# Allegro board 1010260-900-0012_PCB_Rev-a.brd
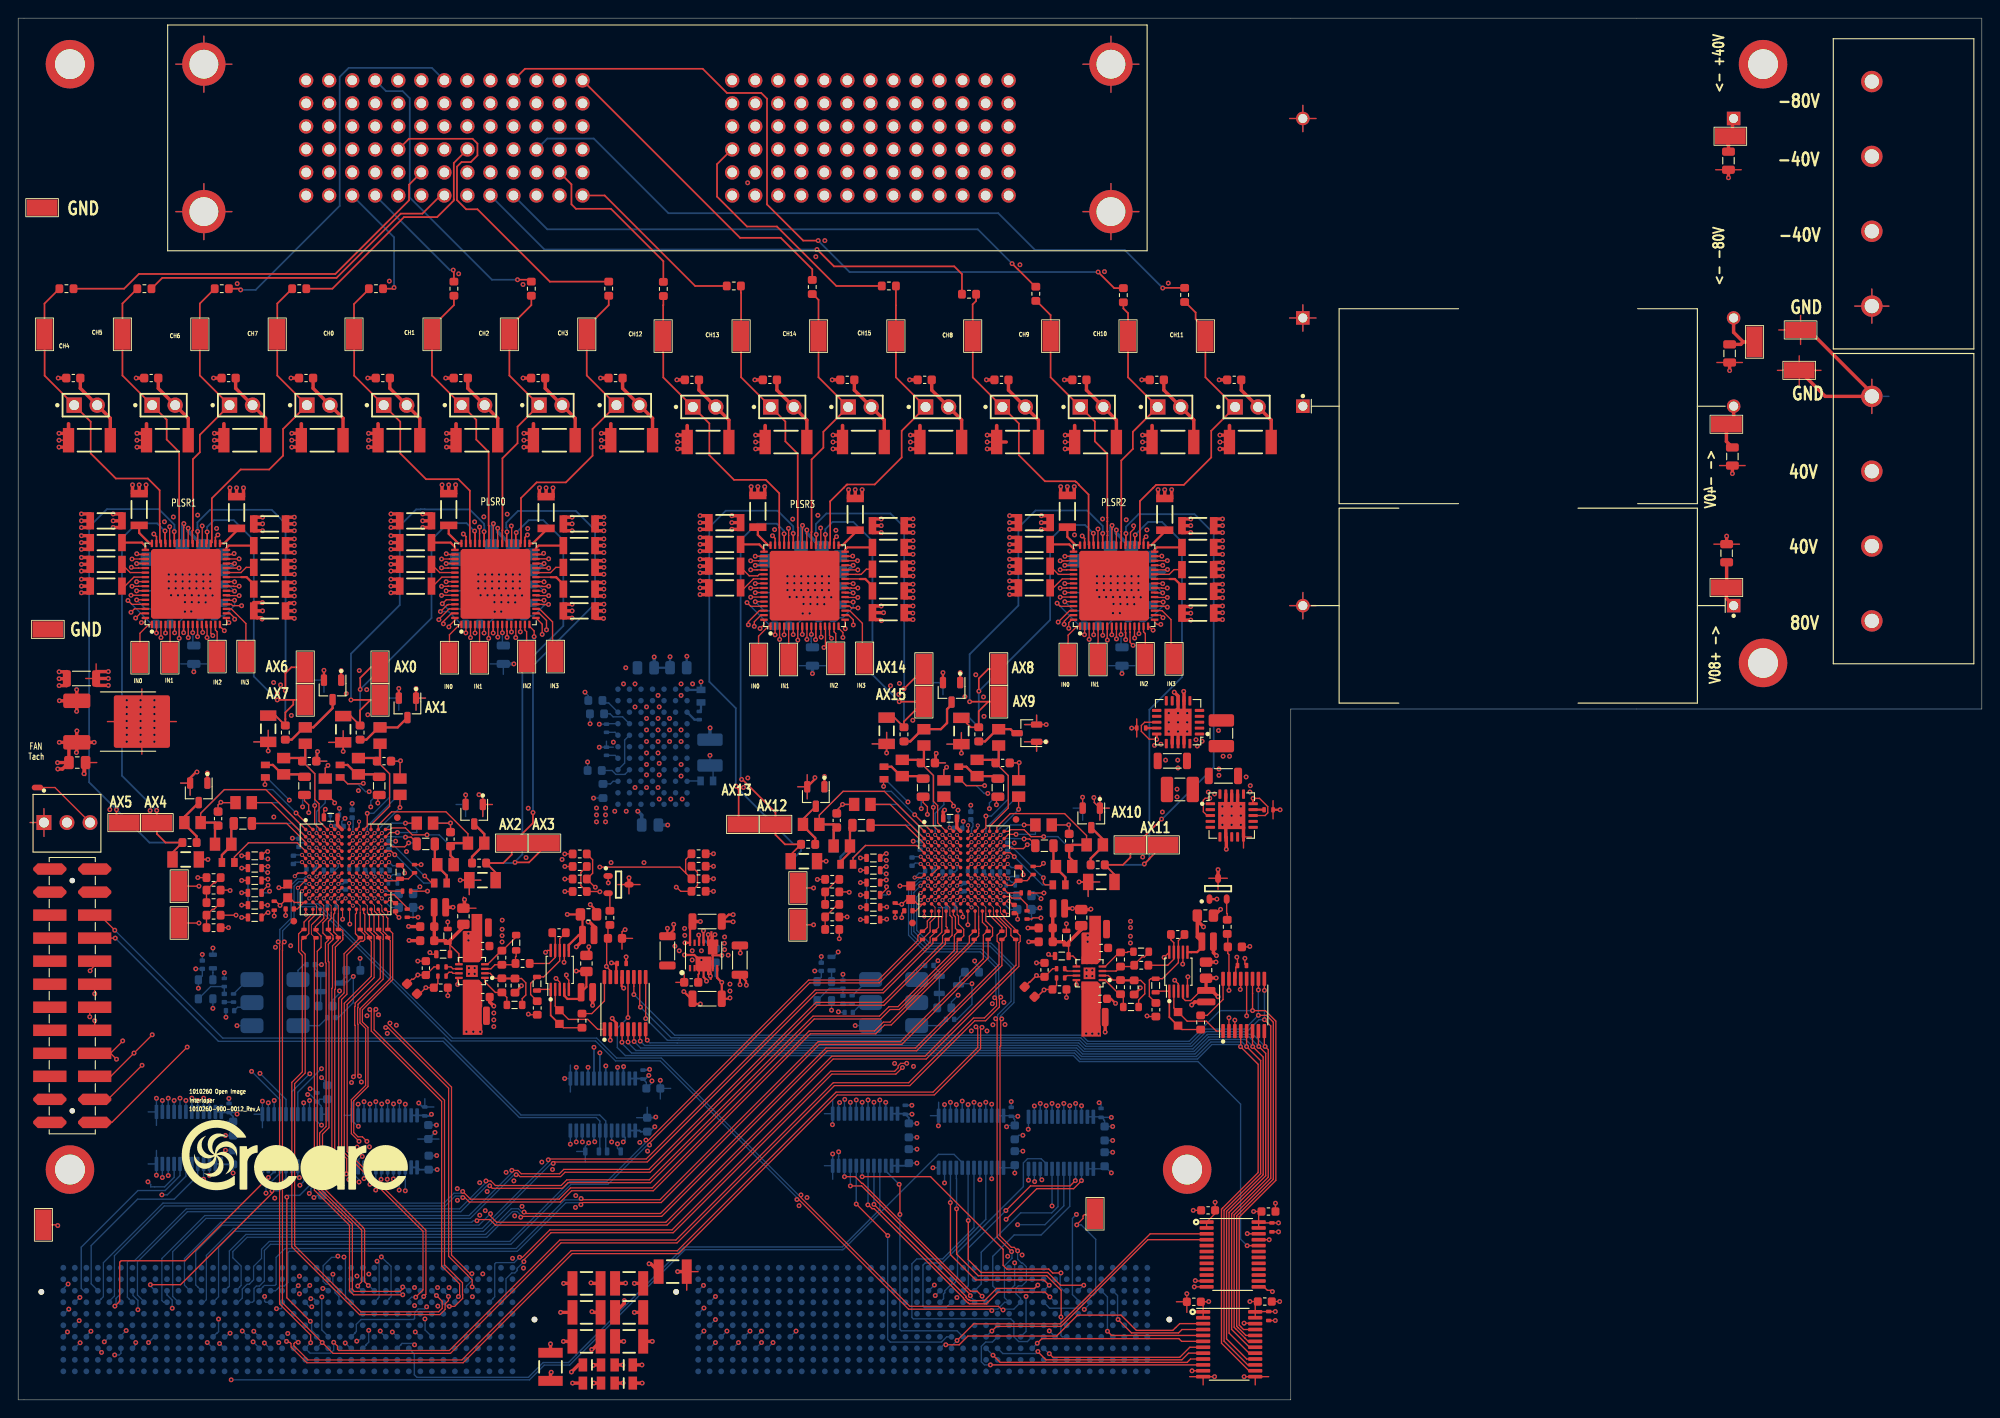
[diagram p0: board, top side]
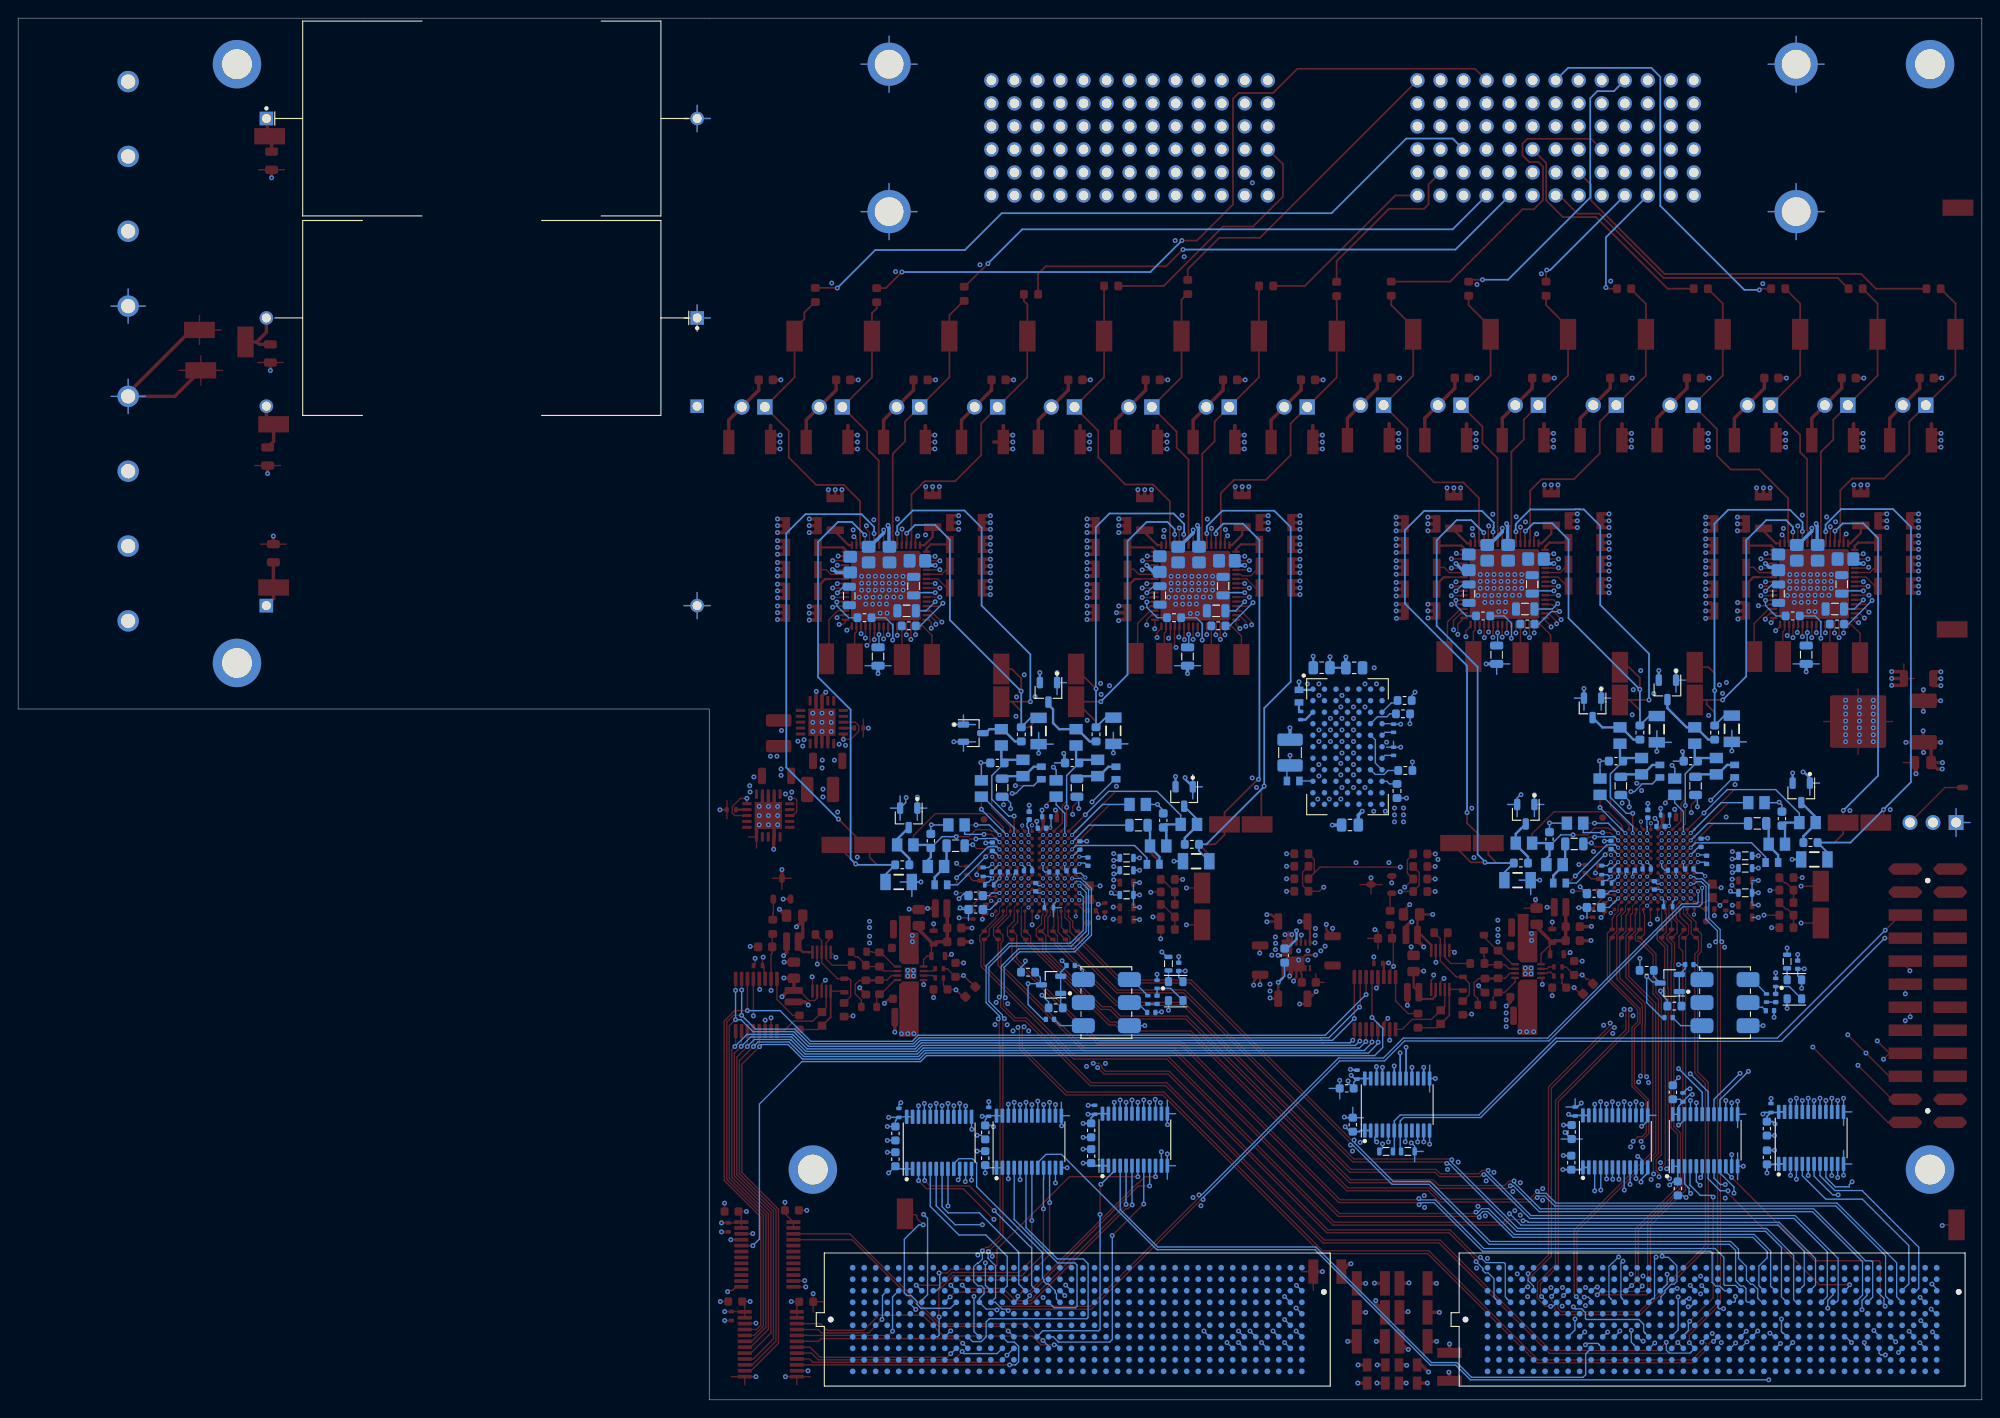
[diagram p1: board, bottom side, seen from below]

Outline 216.53 x 152.4 mm; copper layers: TOP, L2 - GND, L3 - SIG1, L4 - POWER/GND, L5 - POWER, L6 - POWER, L7 - GND, L8 - SIG4, L9 - GND, BOTTOM. Coordinates in mm from the lower left corner of the outline.
Outline path: 0,152.4 0,0 140.33,0 140.33,76.2 216.53,76.2 216.53,152.4 0,152.4

## Design rules (mm)
constraint set DEFAULT: min track width 0.152
net group AFE0_DATA0: nets AFE0_DATA0N AFE0_DATA0P
net group AFE0_DATA1: nets AFE0_DATA1N AFE0_DATA1P
net group AFE0_DATA2: nets AFE0_DATA2N AFE0_DATA2P
net group AFE0_DATA3: nets AFE0_DATA3N AFE0_DATA3P
net group AFE0_DATA4: nets AFE0_DATA4N AFE0_DATA4P
net group AFE0_DATA5: nets AFE0_DATA5N AFE0_DATA5P
net group AFE0_DATA6: nets AFE0_DATA6N AFE0_DATA6P
net group AFE0_DATA7: nets AFE0_DATA7N AFE0_DATA7P
net group AFE0_DCO: nets AFE0_DCON AFE0_DCOP
net group AFE0_FCO: nets AFE0_FCON AFE0_FCOP
net group AFE1_DATA0: nets AFE1_DATA0N AFE1_DATA0P
net group AFE1_DATA1: nets AFE1_DATA1N AFE1_DATA1P
net group AFE1_DATA2: nets AFE1_DATA2N AFE1_DATA2P
net group AFE1_DATA3: nets AFE1_DATA3N AFE1_DATA3P
net group AFE1_DATA4: nets AFE1_DATA4N AFE1_DATA4P
net group AFE1_DATA5: nets AFE1_DATA5N AFE1_DATA5P
net group AFE1_DATA6: nets AFE1_DATA6N AFE1_DATA6P
net group AFE1_DATA7: nets AFE1_DATA7N AFE1_DATA7P
net group AFE1_DCO: nets AFE1_DCON AFE1_DCOP
net group AFE1_FCO: nets AFE1_FCON AFE1_FCOP
net group AFE_CLK: nets AFE_CLKN AFE_CLKP
net group AFE_TRIG: nets AFE_TRIGN AFE_TRIGP
net group INTCAPS: nets N16174964 N16174980 N16175044 N16175092 N16187781 N16187837 N16198090 N16198108 N16201458 N16201474 N16201598 N16201646 N16201868 N16201872 N16201892 N16201896 N16209414 N16209430 N16209554 N16209602 N16209824 N16209828 N16209848 N16209852 N16211890 N16211906 N16212030 N16212078 N16212300 N16212304 N16212324 N16212328

## Placement (name value [footprint] x y rotation side)
C1  10uF  [CAPC2013X100N]  63.27 1.85 0 top
C2  10uF  [CAPC2013X100N]  63.27 3.85 0 top
C3  100uF  [CAPC3225X270N]  62.67 9.65 0 top
C4  100uF  [CAPC3225X270N]  62.67 6.45 0 top
C5  100uF  [CAPC3225X270N]  62.67 12.85 0 top
C6  100uF  [CAPC3225X270N]  72.17 14.15 0 top
C7  0.1uF  [CAPC160X80X90L35N]  131.22 20.9 0 top
C8  1uF  [CAPC100X50X55L15N]  138.25 19.02 270 top
C9  0.1uF  [CAPC160X80X90L35N]  129.64 10.82 0 top
C10  1uF  [CAPC100X50X55L15N]  137.9 9.25 270 top
C11  0.1uF  [CAPC160X80X90L35N]  137.87 20.78 0 top
C12  0.1uF  [CAPC160X80X90L35N]  137.46 10.85 0 top
C13  0.1uF  [CAPC160X80X90L35N]  119.8 26.54 270 bottom
C14  1uF  [CAPC100X50X55L15N]  119.41 31.65 90 bottom
C15  0.1uF  [CAPC160X80X90L35N]  98.21 26.88 270 bottom
C16  1uF  [CAPC100X50X55L15N]  97.82 31.99 90 bottom
C17  10uF  [CAPC2013X100N]  66.77 3.85 180 top
C18  10uF  [CAPC2013X100N]  66.77 1.85 180 top
C19  100uF  [CAPC3225X270N]  67.37 6.45 180 top
C20  100uF  [CAPC3225X270N]  67.37 9.65 180 top
C21  100uF  [CAPC3225X270N]  58.7 3.65 270 top
C22  100uF  [CAPC3225X270N]  67.37 12.85 180 top
C23  0.1uF  [CAPC160X80X90L35N]  23.7 26.75 270 bottom
C24  1uF  [CAPC100X50X55L15N]  23.26 32.19 90 bottom
C25  0.1uF  [CAPC160X80X90L35N]  33.53 23.32 90 bottom
C26  1uF  [CAPC100X50X55L15N]  32.96 33.36 90 bottom
C27  0.1uF  [CAPC160X80X90L35N]  23.71 29.92 270 bottom
C28  0.1uF  [CAPC160X80X90L35N]  34.08 33.93 90 bottom
C29  0.1uF  [CAPC160X80X90L35N]  45.28 26.16 270 bottom
C30  1uF  [CAPC100X50X55L15N]  44.85 31.81 90 bottom
C31  10nF  [CAPC2013X94N]  39.9 73.27 270 bottom
C32  10nF  [CAPC2013X94N]  19.23 63.67 0 top
C33  10nF  [CAPC2013X94N]  42.11 67.63 270 bottom
C34  47pF  [CAPC160X80X87L35N]  40.34 70.45 180 bottom
C35  10nF  [CAPC2013X94N]  37.52 69.89 270 bottom
C36  47pF  [CAPC160X80X87L35N]  22.05 64.11 270 top
C37  10nF  [CAPC2013X94N]  22.61 61.29 0 top
C38  10nF  [CAPC2013X94N]  42.11 67.63 270 top
C39  10nF  [CAPC2013X94N]  39.9 73.27 270 top
C40  10nF  [CAPC2013X94N]  19.23 63.67 0 bottom
C41  10nF  [CAPC2013X94N]  44.86 63.61 180 top
C42  47pF  [CAPC160X80X87L35N]  40.34 70.45 180 top
C43  10nF  [CAPC2013X94N]  37.52 69.89 270 top
C44  47pF  [CAPC160X80X87L35N]  22.05 64.11 270 bottom
C45  10nF  [CAPC2013X94N]  22.61 61.29 0 bottom
C46  10nF  [CAPC2013X94N]  44.86 63.61 180 bottom
C47  10nF  [CAPC2013X94N]  50.5 61.41 180 top
C48  10nF  [CAPC2013X94N]  31.66 73.27 270 bottom
C49  10nF  [CAPC2013X94N]  29.28 69.89 270 bottom
C50  10nF  [CAPC2013X94N]  24.87 65.87 0 top
C51  47pF  [CAPC160X80X87L35N]  47.68 61.85 270 top
C52  10nF  [CAPC2013X94N]  47.12 59.03 180 top
C53  47pF  [CAPC160X80X87L35N]  32.1 70.45 180 bottom
C54  10nF  [CAPC2013X94N]  24.87 65.87 0 bottom
C55  10nF  [CAPC2013X94N]  50.5 61.41 180 bottom
C56  10nF  [CAPC2013X94N]  31.66 73.27 270 top
C57  47pF  [CAPC160X80X87L35N]  47.68 61.85 270 bottom
C58  10nF  [CAPC2013X94N]  47.12 59.03 180 bottom
C59  47pF  [CAPC160X80X87L35N]  32.1 70.45 180 top
C60  10nF  [CAPC2013X94N]  29.28 69.89 270 top
C61  10nF  [CAPC2013X94N]  33.86 67.63 270 bottom
C62  10nF  [CAPC2013X94N]  33.86 67.63 270 top
C63  1nF  [CAPC100X50X55L25N]  36.83 64.64 90 bottom
C64  10nF  [CAPC160X80X90L35N]  44.96 47.62 270 top
C65  1uF  [CAPC100X50X55L15N]  28.23 54.51 90 top
C66  0.1uF  [CAPC100X50X55L20N]  29.95 54.14 180 top
C67  1uF  [CAPC100X50X55L15N]  41.33 57 0 bottom
C68  0.1uF  [CAPC100X50X55L20N]  40.51 58.42 180 bottom
C69  0.1uF  [CAPC100X50X55L20N]  34.16 58.42 180 bottom
C70  10nF  [CAPC160X80X90L35N]  46.61 45.47 180 top
C71  0.1uF  [CAPC100X50X55L20N]  41.62 54.33 270 top
C72  1pF  [CAPC1608X73N]  59.68 42.22 90 top
C73  1uF  [CAPC100X50X55L15N]  41.91 58.42 270 bottom
C74  0.1uF  [CAPC100X50X55L20N]  38.73 58.42 180 bottom
C75  0.1uF  [CAPC100X50X55L20N]  36.96 58.55 0 bottom
C76  0.1uF  [CAPC100X50X55L20N]  32.26 58.55 0 bottom
C77  0.1uF  [CAPC100X50X55L20N]  30.35 59.56 270 bottom
C78  1uF  [CAPC100X50X55L15N]  34.59 54.41 180 bottom
C79  0.1uF  [CAPC100X50X55L20N]  36.11 56.75 270 bottom
C80  0.1uF  [CAPC100X50X55L20N]  30.96 61.44 270 bottom
C81  0.1uF  [CAPC100X50X55L20N]  40.89 61.21 270 bottom
C82  0.1uF  [CAPC100X50X55L20N]  22.73 44.32 270 bottom
C83  0.1uF  [CAPC100X50X55L20N]  20.31 47.99 270 bottom
C84  0.1uF  [CAPC100X50X55L20N]  34.54 42.16 0 bottom
C85  0.1uF  [CAPC100X50X55L20N]  23.37 42.93 180 bottom
C86  0.1uF  [CAPC100X50X55L20N]  32.26 48.01 0 bottom
C87  1uF  [CAPC100X50X55L15N]  34.92 64.52 0 bottom
C88  0.1uF  [CAPC100X50X55L20N]  35.43 63.25 180 bottom
C89  10nF  [CAPC2013X94N]  108.12 73.07 270 bottom
C90  10nF  [CAPC2013X94N]  87.44 63.47 0 top
C91  10nF  [CAPC2013X94N]  110.32 67.43 270 bottom
C92  47pF  [CAPC160X80X87L35N]  108.56 70.25 180 bottom
C93  10nF  [CAPC2013X94N]  105.74 69.69 270 bottom
C94  47pF  [CAPC160X80X87L35N]  90.26 63.91 270 top
C95  10nF  [CAPC2013X94N]  90.82 61.09 0 top
C96  10nF  [CAPC2013X94N]  110.32 67.43 270 top
C97  10nF  [CAPC2013X94N]  108.12 73.07 270 top
C98  10nF  [CAPC2013X94N]  87.44 63.47 0 bottom
C99  10nF  [CAPC2013X94N]  113.07 63.41 180 top
C100  47pF  [CAPC160X80X87L35N]  108.56 70.25 180 top
C101  10nF  [CAPC2013X94N]  105.74 69.69 270 top
C102  47pF  [CAPC160X80X87L35N]  90.26 63.91 270 bottom
C103  10nF  [CAPC2013X94N]  90.82 61.09 0 bottom
C104  10nF  [CAPC2013X94N]  113.07 63.41 180 bottom
C105  10nF  [CAPC2013X94N]  118.71 61.21 180 top
C106  10nF  [CAPC2013X94N]  99.88 73.07 270 bottom
C107  10nF  [CAPC2013X94N]  97.5 69.69 270 bottom
C108  10nF  [CAPC2013X94N]  93.09 65.67 0 top
C109  47pF  [CAPC160X80X87L35N]  115.89 61.65 270 top
C110  10nF  [CAPC2013X94N]  115.33 58.83 180 top
C111  47pF  [CAPC160X80X87L35N]  100.32 70.25 180 bottom
C112  10nF  [CAPC2013X94N]  93.09 65.67 0 bottom
C113  10nF  [CAPC2013X94N]  118.71 61.21 180 bottom
C114  10nF  [CAPC2013X94N]  99.88 73.07 270 top
C115  47pF  [CAPC160X80X87L35N]  115.89 61.65 270 bottom
C116  10nF  [CAPC2013X94N]  115.33 58.83 180 bottom
C117  47pF  [CAPC160X80X87L35N]  100.32 70.25 180 top
C118  10nF  [CAPC2013X94N]  97.5 69.69 270 top
C119  10nF  [CAPC2013X94N]  102.08 67.43 270 bottom
C120  10nF  [CAPC2013X94N]  102.08 67.43 270 top
C121  1nF  [CAPC100X50X55L25N]  105.05 64.45 90 bottom
C122  1uF  [CAPC100X50X55L15N]  96.71 54.31 90 top
C123  0.1uF  [CAPC100X50X55L20N]  109.83 54.14 270 top
C124  1uF  [CAPC100X50X55L15N]  109.45 56.79 0 bottom
C125  0.1uF  [CAPC100X50X55L20N]  102.38 58.22 180 bottom
C126  0.1uF  [CAPC100X50X55L20N]  108.73 58.22 180 bottom
C127  0.1uF  [CAPC100X50X55L20N]  98.17 53.95 180 top
C128  1pF  [CAPC1608X73N]  127.9 42.02 90 top
C129  10nF  [CAPC160X80X90L35N]  114.83 45.27 180 top
C130  10nF  [CAPC160X80X90L35N]  113.17 47.43 270 top
C131  1uF  [CAPC100X50X55L15N]  110.13 58.22 270 bottom
C132  0.1uF  [CAPC100X50X55L20N]  98.57 59.37 270 bottom
C133  0.1uF  [CAPC100X50X55L20N]  105.17 58.35 0 bottom
C134  0.1uF  [CAPC100X50X55L20N]  100.47 58.35 0 bottom
C135  0.1uF  [CAPC100X50X55L20N]  106.95 58.22 180 bottom
C136  10uF  [CAPC200X125X135L45N]  62.89 53.54 0 top
C137  0.1uF  [CAPC127X200X102L25]  119.38 51.92 0 top
C138  1uF  [CAPC100X50X55L15N]  102.88 54.29 180 bottom
C139  0.1uF  [CAPC100X50X55L20N]  99.46 61.14 270 bottom
C140  0.1uF  [CAPC100X50X55L20N]  109.11 61.02 270 bottom
C141  0.1uF  [CAPC100X50X55L20N]  104.33 56.55 270 bottom
C142  0.1uF  [CAPC100X50X55L20N]  88.56 47.76 270 bottom
C143  0.1uF  [CAPC100X50X55L20N]  90.95 44.13 270 bottom
C144  0.1uF  [CAPC100X50X55L20N]  102.76 41.97 0 bottom
C145  0.1uF  [CAPC100X50X55L20N]  91.58 42.73 180 bottom
C146  0.1uF  [CAPC100X50X55L20N]  100.47 47.91 0 bottom
C147  2.2uF  [CAPC200X125X145L30N]  16.22 87.23 180 bottom
C148  2.2uF  [CAPC3317X190N]  27.74 87.02 180 top
C149  2.2uF  [CAPC3317X190N]  9.7 96.95 0 top
C150  2.2uF  [CAPC200X125X145L30N]  53.5 82.19 90 bottom
C151  2.2uF  [CAPC200X125X145L30N]  50.35 87.23 180 bottom
C152  2.2uF  [CAPC200X125X145L30N]  56.55 88.92 90 bottom
C153  2.2uF  [CAPC3317X190N]  61.87 87.02 180 top
C154  2.2uF  [CAPC3317X190N]  43.83 96.95 0 top
C155  2.2uF  [CAPC3317X190N]  61.87 89.42 0 top
C156  2.2uF  [CAPC3317X190N]  58.22 97.87 90 top
C157  2.2uF  [CAPC3317X190N]  43.83 89.75 180 top
C158  2.2uF  [CAPC3317X190N]  47.48 98.2 90 top
C159  1uF  [CAPC200X125X150L55N]  52.24 93.43 90 bottom
C160  2.2uF  [CAPC200X125X145L30N]  49.58 89.95 270 bottom
C161  1uF  [CAPC200X125X150L55N]  54.54 93.43 90 bottom
C162  2.2uF  [CAPC3317X190N]  27.74 89.42 0 top
C163  1uF  [CAPC200X125X150L55N]  56.57 92.38 270 bottom
C164  2.2uF  [CAPC3317X190N]  24.09 97.87 90 top
C165  2.2uF  [CAPC3317X190N]  43.83 92.15 180 top
C166  2.2uF  [CAPC3317X190N]  61.87 91.82 0 top
C167  1uF  [CAPC200X125X150L55N]  49.16 92.74 180 bottom
C168  2.2uF  [CAPC3317X190N]  61.87 94.22 0 top
C169  2.2uF  [CAPC3317X190N]  43.83 94.55 180 top
C170  2.2uF  [CAPC3317X190N]  61.87 96.62 0 top
C171  2.2uF  [CAPC200X125X145L30N]  22.42 88.92 90 bottom
C172  2.2uF  [CAPC200X125X145L30N]  19.37 82.19 90 bottom
C173  2.2uF  [CAPC3317X190N]  9.7 89.75 180 top
C174  2.2uF  [CAPC3317X190N]  13.35 98.2 90 top
C175  1uF  [CAPC200X125X150L55N]  18.11 93.43 90 bottom
C176  1uF  [CAPC200X125X150L55N]  20.41 93.43 90 bottom
C177  2.2uF  [CAPC3317X190N]  9.7 92.15 180 top
C178  2.2uF  [CAPC3317X190N]  27.74 94.22 0 top
C179  2.2uF  [CAPC200X125X145L30N]  15.45 89.95 270 bottom
C180  1uF  [CAPC200X125X150L55N]  15.03 92.74 180 bottom
C181  2.2uF  [CAPC3317X190N]  27.74 91.82 0 top
C182  2.2uF  [CAPC3317X190N]  9.7 94.55 180 top
C183  1uF  [CAPC200X125X150L55N]  22.44 92.38 270 bottom
C184  2.2uF  [CAPC3317X190N]  27.74 96.62 0 top
C185  2.2uF  [CAPC200X125X145L30N]  84.44 87.03 180 bottom
C186  2.2uF  [CAPC3317X190N]  95.95 86.82 180 top
C187  2.2uF  [CAPC3317X190N]  77.91 96.76 0 top
C188  2.2uF  [CAPC3317X190N]  130.08 89.17 0 top
C189  2.2uF  [CAPC3317X190N]  126.43 97.67 90 top
C190  2.2uF  [CAPC200X125X145L30N]  90.64 88.72 90 bottom
C191  2.2uF  [CAPC200X125X145L30N]  87.59 81.99 90 bottom
C192  2.2uF  [CAPC3317X190N]  112.04 89.56 180 top
C193  2.2uF  [CAPC3317X190N]  115.69 98.01 90 top
C194  1uF  [CAPC200X125X150L55N]  120.45 93.23 90 bottom
C195  1uF  [CAPC200X125X150L55N]  122.76 93.23 90 bottom
C196  2.2uF  [CAPC3317X190N]  112.04 91.96 180 top
C197  2.2uF  [CAPC3317X190N]  130.08 94.02 0 top
C198  2.2uF  [CAPC200X125X145L30N]  83.67 89.75 270 bottom
C199  1uF  [CAPC200X125X150L55N]  90.66 92.18 270 bottom
C200  2.2uF  [CAPC3317X190N]  130.08 91.57 0 top
C201  2.2uF  [CAPC3317X190N]  112.04 94.36 180 top
C202  1uF  [CAPC200X125X150L55N]  83.25 92.54 180 bottom
C203  2.2uF  [CAPC3317X190N]  130.08 96.42 0 top
C204  2.2uF  [CAPC200X125X145L30N]  118.57 87.03 180 bottom
C205  2.2uF  [CAPC3317X190N]  130.08 86.77 180 top
C206  2.2uF  [CAPC3317X190N]  112.04 96.76 0 top
C207  220pF  [CAPC160X80X87L35N]  40.21 112.7 180 top
C208  220pF  [CAPC160X80X87L35N]  48.81 112.7 180 top
C209  220pF  [CAPC160X80X87L35N]  57.34 112.7 180 top
C210  220pF  [CAPC160X80X87L35N]  65.88 112.7 180 top
C211  220pF  [CAPC160X80X87L35N]  6.08 112.7 180 top
C212  220pF  [CAPC160X80X87L35N]  14.68 112.7 180 top
C213  220pF  [CAPC160X80X87L35N]  23.21 112.7 180 top
C214  220pF  [CAPC160X80X87L35N]  31.75 112.7 180 top
C215  220pF  [CAPC160X80X87L35N]  108.43 112.5 180 top
C216  220pF  [CAPC160X80X87L35N]  117.02 112.5 180 top
C217  220pF  [CAPC160X80X87L35N]  125.56 112.5 180 top
C218  220pF  [CAPC160X80X87L35N]  134.09 112.5 180 top
C219  220pF  [CAPC160X80X87L35N]  74.3 112.5 180 top
C220  220pF  [CAPC160X80X87L35N]  82.89 112.5 180 top
C221  220pF  [CAPC160X80X87L35N]  91.43 112.5 180 top
C222  220pF  [CAPC160X80X87L35N]  99.96 112.5 180 top
C223  4.7uF  [CAPC2013X145N]  69.68 63.4 0 bottom
C224  4.7uF  [CAPC2013X145N]  69.21 80.74 0 bottom
C225  22uF  [CAPC2013X145N]  72.8 80.75 180 bottom
C226  47uF  [CAPC320X250X280L60N]  76.29 71.4 270 bottom
C227  47uF  [CAPC320X250X280L60N]  128.1 67.32 180 top
C228  10uF  [CAPC320X160X190L30N]  6.98 79.57 0 top
C229  4.7uF  [CAPC2013X145N]  6.52 70.29 0 top
C230  10uF  [CAPC320X160X190L30N]  132.9 68.82 180 top
C231  1uF  [CAPC100X50X55L15N]  137.88 65.09 0 top
C232  10nF  [CAPC160X80X87L35N]  76.88 49.01 270 bottom
C233  10uF  [CAPC320X160X190L30N]  75.97 44.24 0 top
C234  10uF  [CAPC320X160X190L30N]  75.97 52.76 0 top
C235  47uF  [CAPC320X250X280L60N]  132.67 73.52 270 top
C236  10uF  [CAPC320X160X190L30N]  79.58 48.51 90 top
C237  10uF  [CAPC320X160X190L30N]  127.27 70.47 0 top
C238  1uF  [CAPC100X50X55L15N]  123.84 74.11 180 top
C239  10nF  [CAPC160X80X87L35N]  74.22 46.05 0 top
C240  10uF  [CAPC320X160X190L30N]  71.59 49.53 90 top
C241  0.1uF  [CAPC127X200X102L25]  119.23 42.21 0 top
C242  1uF  [CAPC100X50X55L15N]  103.14 64.32 0 bottom
C243  0.1uF  [CAPC127X200X102L25]  62.86 51.28 0 top
C244  0.1uF  [CAPC100X50X55L20N]  103.65 63.05 180 bottom
C245  1000uF  [CAPPAD4750W80L3950D2150]  165.41 109.6 0 top
C246  1000uF  [CAPPAD4750W80L3950D2150]  165.41 141.33 180 bottom
C247  1000uF  [CAPPAD4750W80L3950D2150]  165.41 87.6 180 top
C248  2.2uF  [CAPC3317X190N]  95.95 89.22 0 top
C249  1000uF  [CAPPAD4750W80L3950D2150]  165.41 119.33 0 bottom
C250  2.2uF  [CAPC3317X190N]  92.3 97.67 90 top
C251  2.2uF  [CAPC200X125X145L30N]  124.89 88.67 90 bottom
C252  2.2uF  [CAPC200X125X145L30N]  121.72 81.99 90 bottom
C253  2.2uF  [CAPC3317X190N]  77.91 89.56 180 top
C254  2.2uF  [CAPC3317X190N]  81.56 98.01 90 top
C255  1uF  [CAPC200X125X150L55N]  86.32 93.23 90 bottom
C256  1uF  [CAPC200X125X150L55N]  88.62 93.23 90 bottom
C257  2.2uF  [CAPC3317X190N]  77.91 91.96 180 top
C258  2.2uF  [CAPC3317X190N]  95.95 94.02 0 top
C259  2.2uF  [CAPC200X125X145L30N]  117.8 89.75 270 bottom
C260  1uF  [CAPC200X125X150L55N]  117.38 92.54 180 bottom
C261  2.2uF  [CAPC3317X190N]  95.95 91.62 0 top
C262  2.2uF  [CAPC3317X190N]  77.91 94.36 180 top
C263  1uF  [CAPC200X125X150L55N]  124.79 92.13 270 bottom
C264  2.2uF  [CAPC3317X190N]  95.95 96.42 0 top
C265  1uF  [CAPC100X50X55L15N]  66.55 48.13 180 top
C266  1uF  [CAPC100X50X55L15N]  134.95 47.9 180 top
C267  1nF  [CAPC160X80X90L35N]  119.29 44.24 0 top
C268  1nF  [CAPC160X80X90L35N]  119.42 49.85 0 top
C269  0.1uF  [CAPC127X200X102L25]  51.22 52.1 0 top
C270  1nF  [CAPC160X80X90L35N]  51.2 50.06 0 top
C271  0.1uF  [CAPC127X200X102L25]  51 42.37 0 top
C272  1nF  [CAPC160X80X90L35N]  51.22 44.43 0 top
C273  10uF  [CAPC200X125X135L45N]  130.91 53.42 0 top
C274  0.1uF  [CAPC127X200X102L25]  131.17 50.55 0 top
C275  10uF  [CAPC200X125X135L45N]  130.99 47.4 90 top
C276  0.1uF  [CAPC127X200X102L25]  131.01 44.53 270 top
C277  10uF  [CAPC200X125X135L45N]  49.1 53.34 90 top
C278  0.1uF  [CAPC127X200X102L25]  62.71 44.96 0 top
C279  0.1uF  [CAPC160X80X90L35N]  109.9 26.66 270 bottom
C280  1uF  [CAPC100X50X55L15N]  109.51 31.77 90 bottom
C281  0.1uF  [CAPC160X80X90L35N]  119.8 29.38 270 bottom
C282  0.1uF  [CAPC160X80X90L35N]  98.21 29.72 270 bottom
C283  0.1uF  [CAPC160X80X90L35N]  109.9 29.5 270 bottom
C284  0.1uF  [CAPC160X80X90L35N]  69.37 30.35 270 bottom
C285  1uF  [CAPC100X50X55L15N]  68.9 35.87 90 bottom
C286  0.1uF  [CAPC160X80X90L35N]  45.24 29.54 270 bottom
C287  0.1uF  [CAPC160X80X90L35N]  70.04 34.35 0 bottom
C288  330pF  [CAPC1608X90N]  43.43 45.34 315 top
C289  330pF  [CAPC1608X90N]  111.53 45.01 315 top
C290  470pF  [CAPC160X80X90L25N]  54.74 43.56 180 top
C291  470pF  [CAPC160X80X90L25N]  54.91 50.42 90 top
C292  10uF  [CAPC200X125X135L45N]  62.66 48.13 90 top
C293  0.1uF  [CAPC127X200X102L25]  46.51 54.33 0 top
C294  330pF  [CAPC1608X90N]  45.11 52.2 0 top
C295  330pF  [CAPC1608X90N]  45.11 50.65 0 top
C296  10uF  [CAPC200X125X135L45N]  117.22 53.19 90 top
C297  0.1uF  [CAPC127X200X102L25]  114.76 54.2 0 top
C298  330pF  [CAPC1608X90N]  113.31 50.52 0 top
C299  330pF  [CAPC1608X90N]  113.31 52.04 0 top
C300  470pF  [CAPC160X80X90L25N]  123.83 49.43 180 top
C301  470pF  [CAPC160X80X90L25N]  122.71 43.33 180 top
C302  1uF  [CAPC1608X90N]  65.81 50.9 180 top
C303  1uF  [CAPC1608X90N]  134.16 49.96 180 top
D1  MMBD452LT1G  [SOT23-3P95_237X111L42X43N]  34.42 45.97 90 bottom
D2  MMBD452LT1G  [SOT23-3P95_237X111L42X43N]  102.63 45.78 90 bottom
D3  MMBD4148SE  [SOT23-3P95_240X120L25X48N]  111.23 73.53 270 bottom
D4  MMBD4148SE  [SOT23-3P95_240X120L25X48N]  111.23 73.53 90 top
D5  MMBD4148SE  [SOT23-3P95_240X120L25X48N]  118.33 64.19 180 top
D6  MMBD4148SE  [SOT23-3P95_240X120L25X48N]  118.33 64.19 0 bottom
D7  MMBD4148SE  [SOT23-3P95_240X120L25X48N]  87.96 66.55 180 top
D8  MMBD4148SE  [SOT23-3P95_240X120L25X48N]  87.96 66.55 0 bottom
D9  MMBD4148SE  [SOT23-3P95_240X120L25X48N]  102.93 78.03 0 bottom
D10  MMBD4148SE  [SOT23-3P95_240X120L25X48N]  102.93 78.03 180 top
D11  MMBD4148SE  [SOT23-3P95_240X120L25X48N]  42.93 76.33 0 bottom
D12  MMBD4148SE  [SOT23-3P95_240X120L25X48N]  42.93 76.33 180 top
D13  MMBD4148SE  [SOT23-3P95_240X120L25X48N]  50.29 64.59 180 top
D14  MMBD4148SE  [SOT23-3P95_240X120L25X48N]  50.29 64.59 0 bottom
D15  MMBD4148SE  [SOT23-3P95_240X120L25X48N]  19.91 66.95 180 top
D16  MMBD4148SE  [SOT23-3P95_240X120L25X48N]  19.91 66.95 0 bottom
D17  MMBD4148SE  [SOT23-3P95_240X120L25X48N]  34.67 78.31 0 bottom
D18  MMBD4148SE  [SOT23-3P95_240X120L25X48N]  34.67 78.31 180 top
E1  BLM18SG121  [INDC1608X95N]  29.72 56.13 90 top
E2  BLM18SG121  [INDC1608X95N]  98.42 55.94 90 top
J1  TSM-112-02-L-DV-LC  [SAMTEC_TSM-112-02-L-DV-LC]  5.97 44.58 90 top
J2  ASP-134488-01  [SAMTEC_ASP-134488-01]  99.75 8.86 0 bottom
J3  ASP-134488-01  [SAMTEC_ASP-134488-01]  29.75 8.86 0 bottom
J4  DL1-156RW-6B  [ITT_DL1-156RW-6B]  70.49 139.19 0 top
J5  PBC02SAAN  [SULLINS_PBC02SAAN]  40.31 109.71 0 top
J6  PBC02SAAN  [SULLINS_PBC02SAAN]  48.9 109.71 0 top
J7  PBC02SAAN  [SULLINS_PBC02SAAN]  57.44 109.71 0 top
J8  PBC02SAAN  [SULLINS_PBC02SAAN]  65.97 109.71 0 top
J9  PBC02SAAN  [SULLINS_PBC02SAAN]  6.18 109.71 0 top
J10  PBC02SAAN  [SULLINS_PBC02SAAN]  14.77 109.71 0 top
J11  PBC02SAAN  [SULLINS_PBC02SAAN]  23.31 109.71 0 top
J12  PBC02SAAN  [SULLINS_PBC02SAAN]  31.84 109.71 0 top
J13  PBC02SAAN  [SULLINS_PBC02SAAN]  108.52 109.51 0 top
J14  PBC02SAAN  [SULLINS_PBC02SAAN]  117.12 109.51 0 top
J15  PBC02SAAN  [SULLINS_PBC02SAAN]  125.66 109.51 0 top
J16  PBC02SAAN  [SULLINS_PBC02SAAN]  134.19 109.51 0 top
J17  PBC02SAAN  [SULLINS_PBC02SAAN]  74.39 109.51 0 top
J18  PBC02SAAN  [SULLINS_PBC02SAAN]  82.99 109.51 0 top
J19  PBC02SAAN  [SULLINS_PBC02SAAN]  91.52 109.51 0 top
J20  PBC02SAAN  [SULLINS_PBC02SAAN]  100.06 109.51 0 top
J21  1546927-4  [TE_1546927-4]  207.9 98.3 90 top
J22  1546927-4  [TE_1546927-4]  207.9 133.02 90 top
J23  0022112032  [MOLEX_0022112032]  2.84 63.68 0 top
MTG1  #4  [MTG_4-E]  5.71 147.32 0 top
MTG2  #4  [MTG_4-E]  5.71 25.4 0 top
MTG3  #4  [MTG_4-E]  192.41 81.28 0 top
MTG4  #4  [MTG_4-E]  192.41 147.32 0 top
MTG5  #4  [MTG_4-E]  128.91 25.4 0 top
NOREF  -  []  2.56 11.91 0 top
NOREF#2  -  []  56.94 8.86 90 top
NOREF#3  -  []  56.94 8.86 0 top
NOREF#4  -  []  0 152.4 0 top
NOREF#5  -  []  140.33 0 90 top
NOREF#6  -  []  17.82 22.62 0 top
NOREF#7  -  []  0 0 0 top
NOREF#8  -  []  0 0 90 top
R1  100  [RESC100X50X40L25]  40.77 51.44 270 top
R2  0  [RESC160X85X55L30N]  37.71 73.6 270 bottom
R3  0  [RESC160X85X55L30N]  18.9 61.47 0 top
R4  DNP  [RESC205X125X50L35N]  39.81 67.72 270 bottom
R5  1.37K  [RESC1609X50N]  35.5 69.34 270 bottom
R6  49.9  [RESC3116X65N]  35.84 73.97 90 bottom
R7  49.9  [RESC3116X65N]  18.48 59.61 180 top
R8  100  [RESC100X50X40L25]  39.75 51.44 270 top
R9  DNP  [RESC205X125X50L35N]  39.81 67.72 270 top
R10  1.37K  [RESC1609X50N]  35.5 69.34 270 top
R11  0  [RESC160X85X55L30N]  37.71 73.6 270 top
R12  0  [RESC160X85X55L30N]  18.9 61.47 0 bottom
R13  100  [RESC100X50X40L25]  38.73 51.44 270 top
R14  49.9  [RESC3116X65N]  18.48 59.61 180 bottom
R15  DNP  [RESC205X125X50L35N]  44.95 61.32 180 top
R16  49.9  [RESC3116X65N]  35.84 73.97 90 top
R17  1.37K  [RESC1609X50N]  46.57 57.01 180 top
R18  100  [RESC100X50X40L25]  37.72 51.44 270 top
R19  DNP  [RESC205X125X50L35N]  44.95 61.32 180 bottom
R20  0  [RESC160X85X55L30N]  50.83 59.21 180 top
R21  0  [RESC160X85X55L30N]  29.46 73.6 270 bottom
R22  1.37K  [RESC1609X50N]  46.57 57.01 180 bottom
R23  100  [RESC100X50X40L25]  35.31 51.44 270 top
R24  49.9  [RESC3116X65N]  51.2 57.32 0 top
R25  49.9  [RESC3116X65N]  27.57 74.02 90 bottom
R26  DNP  [RESC205X125X50L35N]  24.78 63.58 0 top
R27  1.37K  [RESC1609X50N]  23.16 59.27 0 top
R28  100  [RESC100X50X40L25]  34.21 51.44 270 top
R29  0  [RESC160X85X55L30N]  50.83 59.21 180 bottom
R30  0  [RESC160X85X55L30N]  29.46 73.6 270 top
R31  DNP  [RESC205X125X50L35N]  24.78 63.58 0 bottom
R32  1.37K  [RESC1609X50N]  23.16 59.27 0 bottom
R33  100  [RESC100X50X40L25]  32.84 51.41 270 top
R34  49.9  [RESC3116X65N]  51.2 57.32 0 bottom
R35  49.9  [RESC3116X65N]  27.57 74.02 90 top
R36  DNP  [RESC205X125X50L35N]  31.57 67.72 270 bottom
R37  1.37K  [RESC1609X50N]  27.26 69.34 270 bottom
R38  100  [RESC100X50X40L25]  31.52 51.44 90 top
R39  DNP  [RESC205X125X50L35N]  31.57 67.72 270 top
R40  1.37K  [RESC1609X50N]  27.26 69.34 270 top
R41  DNP  [RESC160X85X55L30N]  21.55 56.22 180 top
R42  DNP  [RESC160X85X55L30N]  21.55 53.46 180 top
R43  DNP  [RESC160X85X55L30N]  21.55 54.84 0 top
R44  DNP  [RESC160X85X55L30N]  21.55 57.6 0 top
R45  DNP  [RESC160X85X55L30N]  21.55 52.08 180 top
R46  249  [RESC160X85X55L30N]  53.34 48.77 270 top
R47  10K  [RESC160X85X50L30]  47.37 51.18 90 top
R48  0  [RESC160X85X55L30N]  65.25 53.16 270 top
R49  20K  [RESC155X85X50L30N]  57.24 43.23 90 top
R50  249  [RESC160X85X55L30N]  55.63 48.13 180 top
R51  100  [RESC100X50X40L25]  46.74 47.75 180 top
R52  0  [RESC160X85X55L30N]  62.18 41.82 270 top
R53  20K  [RESC155X85X50L30N]  59.64 51.53 180 top
R54  100  [RESC100X50X40L25]  46.74 46.74 180 top
R55  249  [RESC160X85X55L30N]  53.34 45.72 90 top
R56  1K  [RESC160X80X55L30N]  42.76 54.31 180 bottom
R57  10K  [RESC160X85X50L30]  57.22 45.9 90 top
R58  1K  [RESC160X80X55L30N]  42.76 55.83 180 bottom
R59  10K  [RESC160X85X50L30]  46.86 49.15 0 top
R60  10K  [RESC160X85X50L30]  115.59 50.98 90 top
R61  10K  [RESC160X85X50L30]  42.1 58.22 90 top
R62  0  [RESC160X85X55L30N]  36.96 47.37 0 bottom
R63  10  [RESC100X50X40L25]  43.71 58.59 90 top
R64  0  [RESC160X85X55L30N]  33.91 43.43 0 bottom
R65  10  [RESC100X50X40L25]  42.91 53.68 270 top
R66  10  [RESC100X50X40L25]  42.84 56.11 0 top
R67  10K  [RESC160X85X50L30]  21.48 48.35 270 bottom
R68  10K  [RESC160X85X50L30]  26.09 58.65 0 top
R69  10K  [RESC160X85X50L30]  26.09 58.65 0 bottom
R70  10K  [RESC160X85X50L30]  26.09 55.93 0 top
R71  100  [RESC100X50X40L25]  23.75 44.32 90 bottom
R72  10K  [RESC160X85X50L30]  26.09 54.57 0 top
R73  10K  [RESC160X85X50L30]  26.09 53.21 0 top
R74  100  [RESC100X50X40L25]  22.73 46.04 270 bottom
R75  10K  [RESC160X85X50L30]  26.09 60.01 0 top
R76  10K  [RESC160X85X50L30]  26.09 60.01 0 bottom
R77  10K  [RESC160X85X50L30]  26.09 55.93 0 bottom
R78  10K  [RESC160X85X50L30]  26.09 57.29 0 top
R79  10K  [RESC160X85X50L30]  34.47 64.25 0 top
R80  100  [RESC100X50X40L25]  110 51.24 270 top
R81  0  [RESC160X85X55L30N]  105.92 73.4 270 bottom
R82  0  [RESC160X85X55L30N]  87.11 61.27 0 top
R83  DNP  [RESC205X125X50L35N]  108.03 67.52 270 bottom
R84  1.37K  [RESC1609X50N]  103.72 69.14 270 bottom
R85  49.9  [RESC3116X65N]  104.01 73.77 90 bottom
R86  49.9  [RESC3116X65N]  86.64 59.41 180 top
R87  100  [RESC100X50X40L25]  108.48 51.24 90 top
R88  DNP  [RESC205X125X50L35N]  108.03 67.52 270 top
R89  1.37K  [RESC1609X50N]  103.72 69.14 270 top
R90  0  [RESC160X85X55L30N]  105.92 73.4 270 top
R91  0  [RESC160X85X55L30N]  87.11 61.27 0 bottom
R92  100  [RESC100X50X40L25]  106.95 51.24 90 top
R93  49.9  [RESC3116X65N]  86.64 59.41 180 bottom
R94  DNP  [RESC205X125X50L35N]  113.16 61.12 180 top
R95  49.9  [RESC3116X65N]  104.01 73.77 90 top
R96  1.37K  [RESC1609X50N]  114.78 56.81 180 top
R97  100  [RESC100X50X40L25]  105.43 51.24 90 top
R98  DNP  [RESC205X125X50L35N]  113.16 61.12 180 bottom
R99  0  [RESC160X85X55L30N]  119.04 59.01 180 top
R100  0  [RESC160X85X55L30N]  97.68 73.4 270 bottom
R101  1.37K  [RESC1609X50N]  114.78 56.81 180 bottom
R102  100  [RESC100X50X40L25]  103.78 51.24 90 top
R103  49.9  [RESC3116X65N]  119.44 57.12 0 top
R104  49.9  [RESC3116X65N]  95.77 73.8 90 bottom
R105  DNP  [RESC205X125X50L35N]  92.99 63.38 0 top
R106  1.37K  [RESC1609X50N]  91.37 59.07 0 top
R107  100  [RESC100X50X40L25]  102.43 51.24 90 top
R108  0  [RESC160X85X55L30N]  119.04 59.01 180 bottom
R109  0  [RESC160X85X55L30N]  97.68 73.4 270 top
R110  DNP  [RESC205X125X50L35N]  92.99 63.38 0 bottom
R111  1.37K  [RESC1609X50N]  91.37 59.07 0 bottom
R112  100  [RESC100X50X40L25]  101.06 51.24 90 top
R113  49.9  [RESC3116X65N]  119.44 57.12 0 bottom
R114  49.9  [RESC3116X65N]  95.77 73.8 90 top
R115  DNP  [RESC205X125X50L35N]  99.79 67.52 270 bottom
R116  1.37K  [RESC1609X50N]  95.48 69.14 270 bottom
R117  100  [RESC100X50X40L25]  99.71 51.24 90 top
R118  DNP  [RESC205X125X50L35N]  99.79 67.52 270 top
R119  1.37K  [RESC1609X50N]  95.48 69.14 270 top
R120  DNP  [RESC160X85X55L30N]  89.77 56.03 180 top
R121  DNP  [RESC160X85X55L30N]  89.77 53.27 180 top
R122  DNP  [RESC160X85X55L30N]  89.77 54.65 0 top
R123  DNP  [RESC160X85X55L30N]  89.77 57.41 0 top
R124  DNP  [RESC160X85X55L30N]  89.77 51.89 180 top
R125  249  [RESC160X85X55L30N]  123.84 47.94 180 top
R126  249  [RESC160X85X55L30N]  121.56 48.57 270 top
R127  0  [RESC160X85X55L30N]  133.32 52.17 270 top
R128  20K  [RESC155X85X50L30N]  125.46 43.03 90 top
R129  100  [RESC100X50X40L25]  114.95 47.55 180 top
R130  100  [RESC100X50X40L25]  114.95 46.54 180 top
R131  0  [RESC160X85X55L30N]  130.39 41.63 270 top
R132  20K  [RESC155X85X50L30N]  127.86 51.33 180 top
R133  249  [RESC160X85X55L30N]  121.56 45.52 90 top
R134  1K  [RESC160X80X55L30N]  110.95 54.09 180 bottom
R135  10K  [RESC160X85X50L30]  125.43 45.7 90 top
R136  10K  [RESC160X85X50L30]  115.08 48.95 0 top
R137  1K  [RESC160X80X55L30N]  110.95 55.61 180 bottom
R138  DNP  [RESC160X85X55L30N]  63.65 77.14 0 bottom
R139  DNP  [RESC160X85X55L30N]  64.49 67.16 90 bottom
R140  10K  [RESC160X85X50L30]  110.32 58.02 90 top
R141  0  [RESC160X85X55L30N]  105.17 47.17 0 bottom
R142  10  [RESC100X50X40L25]  111.93 58.39 90 top
R143  0  [RESC160X85X55L30N]  102.13 43.24 0 bottom
R144  10  [RESC100X50X40L25]  111.25 53.48 270 top
R145  10K  [RESC160X85X50L30]  89.69 48.11 270 bottom
R146  10  [RESC100X50X40L25]  111.06 55.92 0 top
R147  10K  [RESC160X85X50L30]  94.3 58.41 0 top
R148  10K  [RESC160X85X50L30]  94.3 58.41 0 bottom
R149  10K  [RESC160X85X50L30]  94.3 55.69 0 top
R150  100  [RESC100X50X40L25]  91.97 44.13 90 bottom
R151  10K  [RESC160X85X50L30]  94.3 54.33 0 top
R152  10K  [RESC160X85X50L30]  94.3 52.97 0 top
R153  100  [RESC100X50X40L25]  90.95 45.84 270 bottom
R154  10K  [RESC160X85X50L30]  94.3 59.77 0 top
R155  10K  [RESC160X85X50L30]  94.3 59.77 0 bottom
R156  10K  [RESC160X85X50L30]  94.3 55.69 0 bottom
R157  10K  [RESC160X85X50L30]  94.3 57.05 0 top
R158  10K  [RESC160X85X50L30]  102.76 64.14 0 top
R159  0  [RESC160X85X55L30N]  15.98 85.57 180 bottom
R160  0  [RESC160X85X55L30N]  50.11 85.57 180 bottom
R161  0  [RESC160X85X55L30N]  20.86 86.46 180 bottom
R162  0  [RESC160X85X55L30N]  54.99 86.46 180 bottom
R163  0  [RESC160X85X55L30N]  84.2 85.38 180 bottom
R164  0  [RESC160X85X55L30N]  118.33 85.38 180 bottom
R165  0  [RESC160X85X55L30N]  89.08 86.27 180 bottom
R166  0  [RESC160X85X55L30N]  123.21 86.27 180 bottom
R167  0  [RESC160X85X55L30N]  39.46 122.56 0 top
R168  0  [RESC160X85X55L30N]  48.05 122.56 90 top
R169  0  [RESC160X85X55L30N]  56.59 122.56 90 top
R170  0  [RESC160X85X55L30N]  65.12 122.56 90 top
R171  1k  [RESC5025X70N]  41.99 105.84 0 top
R172  1k  [RESC5025X70N]  50.59 105.84 0 top
R173  1k  [RESC5025X70N]  59.12 105.84 0 top
R174  1k  [RESC5025X70N]  67.65 105.84 0 top
R175  0  [RESC160X85X55L30N]  5.33 122.56 0 top
R176  0  [RESC160X85X55L30N]  13.92 122.56 0 top
R177  0  [RESC160X85X55L30N]  22.46 122.56 0 top
R178  0  [RESC160X85X55L30N]  30.99 122.56 0 top
R179  1k  [RESC5025X70N]  7.86 105.84 0 top
R180  1k  [RESC5025X70N]  16.45 105.84 0 top
R181  1k  [RESC5025X70N]  24.99 105.84 0 top
R182  1k  [RESC5025X70N]  33.52 105.84 0 top
R183  0  [RESC160X85X55L30N]  104.85 121.95 180 top
R184  0  [RESC160X85X55L30N]  112.22 122 90 top
R185  0  [RESC160X85X55L30N]  121.87 121.84 90 top
R186  0  [RESC160X85X55L30N]  128.63 121.87 90 top
R187  1k  [RESC5025X70N]  110.21 105.65 0 top
R188  1k  [RESC5025X70N]  118.8 105.65 0 top
R189  1k  [RESC5025X70N]  127.34 105.65 0 top
R190  1k  [RESC5025X70N]  135.87 105.65 0 top
R191  100K  [RESC100X50X40L25]  75.11 75.48 90 bottom
R192  5.62K  [RESC1609X50N]  75.3 77.62 90 bottom
R193  120K  [RESC1609X50N]  75.94 68.26 0 bottom
R194  80.6K  [RESC100X50X40L25]  64.87 74.08 270 bottom
R195  80.6K  [RESC100X50X40L25]  64.87 71.54 270 bottom
R196  0  [RESC160X85X55L30N]  71.15 122.53 90 top
R197  0  [RESC160X85X55L30N]  78.92 122.86 180 top
R198  0  [RESC160X85X55L30N]  87.57 122.75 90 top
R199  0  [RESC160X85X55L30N]  96.01 122.86 180 top
R200  1k  [RESC5025X70N]  76.08 105.65 0 top
R201  1k  [RESC5025X70N]  84.67 105.65 0 top
R202  1k  [RESC5025X70N]  93.21 105.65 0 top
R203  1k  [RESC5025X70N]  101.74 105.65 0 top
R204  10M  [RESC205X125X50L35N]  188.39 93.38 270 top
R205  10M  [RESC205X125X50L35N]  188.59 136.68 90 top
R206  10M  [RESC205X125X50L35N]  189.03 104.05 90 top
R207  10M  [RESC205X125X50L35N]  188.72 115.42 90 top
R208  DNP  [RESC160X85X55L30N]  63.58 69.42 0 bottom
R209  DNP  [RESC160X85X55L30N]  63.83 75.67 0 bottom
R210  249  [RESC160X85X55L30N]  54.79 45.69 270 top
R211  249  [RESC160X85X55L30N]  123.06 45.49 270 top
R212  10K  [RESC160X85X50L30]  65.69 27.4 180 bottom
R213  10K  [RESC160X85X50L30]  63.29 27.4 0 bottom
R214  0  [RESC160X85X55L30N]  75.03 58.85 0 top
R215  0  [RESC160X85X55L30N]  75.03 60.23 0 top
R216  0  [RESC160X85X55L30N]  75.03 57.47 0 top
R217  0  [RESC160X85X55L30N]  75.03 56.09 0 top
R218  0  [RESC160X85X55L30N]  61.93 56.07 180 top
R219  0  [RESC160X85X55L30N]  61.93 57.45 180 top
R220  0  [RESC160X85X55L30N]  61.93 58.83 180 top
R221  0  [RESC160X85X55L30N]  61.93 60.21 180 top
T1  ADT1-1WT  [MINICIRCUITS_ADT1-1WT]  28.32 43.81 90 bottom
T2  ADT1-1WT  [MINICIRCUITS_ADT1-1WT]  96.54 43.82 90 bottom
TP1  5015  [TP340X180N]  118.75 20.52 90 top
TP2  5015  [TP340X180N]  2.79 19.3 90 top
TP3  5015  [TP340X180N]  39.9 80.8 270 top
TP4  5015  [TP340X180N]  15.3 63.67 0 top
TP5  5015  [TP340X180N]  39.9 77.2 270 top
TP6  5015  [TP340X180N]  11.69 63.67 0 top
TP7  5015  [TP340X180N]  54.43 61.41 180 top
TP8  5015  [TP340X180N]  31.66 80.8 270 top
TP9  5015  [TP340X180N]  58.03 61.41 180 top
TP10  5015  [TP340X180N]  31.66 77.2 270 top
TP11  5015  [TP340X180N]  17.76 56.66 270 top
TP12  5015  [TP340X180N]  17.76 52.59 270 top
TP13  5015  [TP340X180N]  108.12 80.61 270 top
TP14  5015  [TP340X180N]  83.51 63.47 0 top
TP15  5015  [TP340X180N]  108.12 77.01 270 top
TP16  5015  [TP340X180N]  79.91 63.47 0 top
TP17  5015  [TP340X180N]  122.65 61.21 180 top
TP18  5015  [TP340X180N]  99.88 80.61 270 top
TP19  5015  [TP340X180N]  126.25 61.21 180 top
TP20  5015  [TP340X180N]  99.88 77.01 270 top
TP21  5015  [TP340X180N]  85.98 56.46 270 top
TP22  5015  [TP340X180N]  85.98 52.4 270 top
TP23  5015  [TP340X180N]  13.43 81.86 270 top
TP24  5015  [TP340X180N]  47.56 81.86 270 top
TP25  5015  [TP340X180N]  16.73 81.86 270 top
TP26  5015  [TP340X180N]  50.86 81.86 270 top
TP27  5015  [TP340X180N]  21.94 81.98 270 top
TP28  5015  [TP340X180N]  56.07 81.98 270 top
TP29  5015  [TP340X180N]  25.12 81.98 270 top
TP30  5015  [TP340X180N]  59.25 81.98 270 top
TP31  5015  [TP340X180N]  81.65 81.66 270 top
TP32  5015  [TP340X180N]  115.78 81.66 270 top
TP33  5015  [TP340X180N]  84.95 81.66 270 top
TP34  5015  [TP340X180N]  119.08 81.66 270 top
TP35  5015  [TP340X180N]  90.16 81.79 270 top
TP36  5015  [TP340X180N]  124.29 81.73 270 top
TP37  5015  [TP340X180N]  93.33 81.79 270 top
TP38  5015  [TP340X180N]  127.46 81.73 270 top
TP39  5015  [TP340X180N]  37.04 117.53 270 top
TP40  5015  [TP340X180N]  45.63 117.53 270 top
TP41  5015  [TP340X180N]  54.17 117.53 270 top
TP42  5015  [TP340X180N]  62.7 117.53 270 top
TP43  5015  [TP340X180N]  20.04 117.53 270 top
TP44  5015  [TP340X180N]  2.91 117.53 270 top
TP45  5015  [TP340X180N]  11.5 117.53 270 top
TP46  5015  [TP340X180N]  28.57 117.53 270 top
TP47  5015  [TP340X180N]  105.25 117.33 270 top
TP48  5015  [TP340X180N]  113.85 117.33 270 top
TP49  5015  [TP340X180N]  122.38 117.33 270 top
TP50  5015  [TP340X180N]  130.92 117.33 270 top
TP51  5015  [TP340X180N]  71.12 117.33 270 top
TP52  5015  [TP340X180N]  79.72 117.33 270 top
TP53  5015  [TP340X180N]  88.25 117.33 270 top
TP54  5015  [TP340X180N]  96.79 117.33 270 top
TP55  5015  [TP340X180N]  2.64 131.5 0 top
TP56  5015  [TP340X180N]  3.28 84.98 0 top
TP57  5015  [TP340X180N]  196.39 113.55 0 top
TP58  5015  [TP340X180N]  196.55 118.01 0 top
TP59  5015  [TP340X180N]  191.47 116.69 270 top
TP60  5015  [TP340X180N]  188.36 107.6 0 top
TP61  5015  [TP340X180N]  188.8 139.37 0 top
TP62  5015  [TP340X180N]  188.36 89.6 0 top
TP63  DNP  [TP_B127X64]  2.13 67.54 0 top
U1  SN74AVCH8T245PW  [SOP24P65_780X640X120L62X24N]  133.92 16.04 270 top
U2  SN74AVCH8T245PW  [SOP24P65_780X640X120L62X24N]  133.54 6.13 270 top
U3  SN74AVCH8T245PW  [SOP24P65_780X640X120L62X24N]  114.98 28.35 180 bottom
U4  SN74AVCH8T245PW  [SOP24P65_780X640X120L62X24N]  93.39 28.69 180 bottom
U5  SN74AVCH8T245PW  [SOP24P65_780X640X120L62X24N]  105.08 28.47 180 bottom
U6  SN74AVCH8T245PW  [SOP24P65_780X640X120L62X24N]  18.83 28.89 180 bottom
U7  SN74AVCH8T245PW  [SOP24P65_780X640X120L62X24N]  30.51 28.64 180 bottom
U8  SN74AVCH8T245PW  [SOP24P65_780X640X120L62X24N]  40.42 28.51 180 bottom
U9  SN74AVCH8T245PW  [SOP24P65_780X640X120L62X24N]  64.47 32.57 180 bottom
U10  AD9670BBCZ  [BGA144CP80_12X12_1000X1000X140B45N]  36.11 58.51 270 top
U11  ADA4938-1  [QFN17P50_300X300X80L40X24T130N]  118.13 47.05 90 top
U19  ADA4938-1  [QFN17P50_300X300X80L40X24T130N]  50.04 47.29 90 top
U20  MAX6018AEUR16+T  [SOT95P237X112-3N]  66.21 56.83 0 top
U21  AD5424YRUZ  [SOP16P65_500X640X120L60X24N]  66.92 43.76 0 top
U22  ADA4897-2ARMZ  [SOP10P50_300X490X110L55X22N]  59.72 47.43 0 top
U23  AD9670BBCZ  [BGA144CP80_12X12_1000X1000X140B45N]  104.32 58.31 270 top
U33  MAX6018AEUR16+T  [SOT95P237X112-3N]  132.31 56.38 90 top
U34  AD5424YRUZ  [SOP16P65_500X640X120L60X24N]  135.14 43.56 0 top
U35  ADA4897-2ARMZ  [SOP10P50_300X490X110L55X22N]  127.94 47.23 0 top
U36  HV7321K6-G  [QFN65P50_900X900X100L40X24T770N]  18.5 90 0 top
U37  HV7321K6-G  [QFN65P50_900X900X100L40X24T770N]  52.63 90 0 top
U38  HV7321K6-G  [QFN65P50_900X900X100L40X24T770N]  120.85 89.8 0 top
U39  HV7321K6-G  [QFN65P50_900X900X100L40X24T770N]  86.72 89.8 0 top
U40  LTM8049EY#PBF-ND  [BGA77CP127_11X7_1500X900X262B75N]  69.95 72.04 270 bottom
U41  TPS7A4700  [QFN21P65_500X500X100L55X30T300N]  133.82 64.45 270 top
U42  NCP5501DT50G  [TO229P990X238-3_4N]  10.86 74.81 270 top
U43  LT3032EDE-5#PBF  [LINEAR_DE14MA]  75.59 49.02 0 top
U44  TPS7A4700  [QFN21P65_500X500X100L55X30T300N]  127.9 74.74 90 top
Y1  18MHz  [PSON4P210_320X250X80L70X90N]  20.67 45.28 270 bottom
Y2  18MHz  [PSON4P210_320X250X80L70X90N]  88.89 45.08 270 bottom

## Library data of the parts
C1-C244 C248 C250-C303 = CAP
C245-C247 C249 = CAP_P
D1 D2 = DIODE_SCHOTTKY_A_C_CA
D3-D18 = DIODE_DUAL_A1_C2_C1A2
E1 E2 = Ferrite_Bead
J1 = Header_24-Pin_2-Row
J2 J3 = Header_400-Pin_10-Row
J4 = ITT_DL1-156RW-6B
J5-J20 = Header_2-Pin
J21 J22 = Header_4-Pin
J23 = Header_3-Pin
MTG1-MTG5 = MTG
R1-R221 = RES
T1 T2 = ADT1-1WT
TP1-TP62 = TESTPOINT
TP63 = TESTPOINT: room: POWER
U1-U9 = SN74AVCH8T245PW
U10 U23 = AD9670
U11 U19 = ADA4938-1
U20 U33 = MAX6018
U21 U34 = AD5424YRUZ
U22 U35 = ADA4897-2_ALT
U36-U39 = HV7321K6-G
U40 = LTM8049
U41 U44 = TPS7A4700
U42 = NCP5501DT50G
U43 = LT3032
Y1 Y2 = OSC_4P

## Footprints (pads in the part's own frame, mm; a bottom-side part is the same pattern mirrored in y, then rotated)
BGA77CP127_11X7_1500X900X262B75N
  round 0.61 smd: A1(-6.35,-3.81) A2(-6.35,-2.54) A3(-6.35,-1.27) A4(-6.35,0) A5(-6.35,1.27) A6(-6.35,2.54) A7(-6.35,3.81) B1(-5.08,-3.81) B2(-5.08,-2.54) B3(-5.08,-1.27) B4(-5.08,0) B5(-5.08,1.27) B6(-5.08,2.54) B7(-5.08,3.81) C1(-3.81,-3.81) C2(-3.81,-2.54) C3(-3.81,-1.27) C4(-3.81,0) C5(-3.81,1.27) C6(-3.81,2.54) C7(-3.81,3.81) D1(-2.54,-3.81) D2(-2.54,-2.54) D3(-2.54,-1.27) D4(-2.54,0) D5(-2.54,1.27) D6(-2.54,2.54) D7(-2.54,3.81) E1(-1.27,-3.81) E2(-1.27,-2.54) E3(-1.27,-1.27) E4(-1.27,0) E5(-1.27,1.27) E6(-1.27,2.54) E7(-1.27,3.81) F1(0,-3.81) F2(0,-2.54) F3(0,-1.27) F4(0,0) F5(0,1.27) F6(0,2.54) F7(0,3.81) G1(1.27,-3.81) G2(1.27,-2.54) G3(1.27,-1.27) G4(1.27,0) G5(1.27,1.27) G6(1.27,2.54) G7(1.27,3.81) H1(2.54,-3.81) H2(2.54,-2.54) H3(2.54,-1.27) H4(2.54,0) H5(2.54,1.27) H6(2.54,2.54) H7(2.54,3.81) J1(3.81,-3.81) J2(3.81,-2.54) J3(3.81,-1.27) J4(3.81,0) J5(3.81,1.27) J6(3.81,2.54) J7(3.81,3.81) K1(5.08,-3.81) K2(5.08,-2.54) K3(5.08,-1.27) K4(5.08,0) K5(5.08,1.27) K6(5.08,2.54) K7(5.08,3.81) L1(6.35,-3.81) L2(6.35,-2.54) L3(6.35,-1.27) L4(6.35,0) L5(6.35,1.27) L6(6.35,2.54) L7(6.35,3.81)
BGA144CP80_12X12_1000X1000X140B45N
  round 0.75 smd: (-5.71,5.71) (5.71,-5.71)
  round 0.41 smd: A1(-4.4,-4.4) A2(-4.4,-3.6) A3(-4.4,-2.8) A4(-4.4,-2) A5(-4.4,-1.2) A6(-4.4,-0.4) A7(-4.4,0.4) A8(-4.4,1.2) A9(-4.4,2) A10(-4.4,2.8) A11(-4.4,3.6) A12(-4.4,4.4) B1(-3.6,-4.4) B2(-3.6,-3.6) B3(-3.6,-2.8) B4(-3.6,-2) B5(-3.6,-1.2) B6(-3.6,-0.4) B7(-3.6,0.4) B8(-3.6,1.2) B9(-3.6,2) B10(-3.6,2.8) B11(-3.6,3.6) B12(-3.6,4.4) C1(-2.8,-4.4) C2(-2.8,-3.6) C3(-2.8,-2.8) C4(-2.8,-2) C5(-2.8,-1.2) C6(-2.8,-0.4) C7(-2.8,0.4) C8(-2.8,1.2) C9(-2.8,2) C10(-2.8,2.8) C11(-2.8,3.6) C12(-2.8,4.4) D1(-2,-4.4) D2(-2,-3.6) D3(-2,-2.8) D4(-2,-2) D5(-2,-1.2) D6(-2,-0.4) D7(-2,0.4) D8(-2,1.2) D9(-2,2) D10(-2,2.8) D11(-2,3.6) D12(-2,4.4) E1(-1.2,-4.4) E2(-1.2,-3.6) E3(-1.2,-2.8) E4(-1.2,-2) E5(-1.2,-1.2) E6(-1.2,-0.4) E7(-1.2,0.4) E8(-1.2,1.2) E9(-1.2,2) E10(-1.2,2.8) E11(-1.2,3.6) E12(-1.2,4.4) F1(-0.4,-4.4) F2(-0.4,-3.6) F3(-0.4,-2.8) F4(-0.4,-2) F5(-0.4,-1.2) F6(-0.4,-0.4) F7(-0.4,0.4) F8(-0.4,1.2) F9(-0.4,2) F10(-0.4,2.8) F11(-0.4,3.6) F12(-0.4,4.4) G1(0.4,-4.4) G2(0.4,-3.6) G3(0.4,-2.8) G4(0.4,-2) G5(0.4,-1.2) G6(0.4,-0.4) G7(0.4,0.4) G8(0.4,1.2) G9(0.4,2) G10(0.4,2.8) G11(0.4,3.6) G12(0.4,4.4) H1(1.2,-4.4) H2(1.2,-3.6) H3(1.2,-2.8) H4(1.2,-2) H5(1.2,-1.2) H6(1.2,-0.4) H7(1.2,0.4) H8(1.2,1.2) H9(1.2,2) H10(1.2,2.8) H11(1.2,3.6) H12(1.2,4.4) J1(2,-4.4) J2(2,-3.6) J3(2,-2.8) J4(2,-2) J5(2,-1.2) J6(2,-0.4) J7(2,0.4) J8(2,1.2) J9(2,2) J10(2,2.8) J11(2,3.6) J12(2,4.4) K1(2.8,-4.4) K2(2.8,-3.6) K3(2.8,-2.8) K4(2.8,-2) K5(2.8,-1.2) K6(2.8,-0.4) K7(2.8,0.4) K8(2.8,1.2) K9(2.8,2) K10(2.8,2.8) K11(2.8,3.6) K12(2.8,4.4) L1(3.6,-4.4) L2(3.6,-3.6) L3(3.6,-2.8) L4(3.6,-2) L5(3.6,-1.2) L6(3.6,-0.4) L7(3.6,0.4) L8(3.6,1.2) L9(3.6,2) L10(3.6,2.8) L11(3.6,3.6) L12(3.6,4.4) M1(4.4,-4.4) M2(4.4,-3.6) M3(4.4,-2.8) M4(4.4,-2) M5(4.4,-1.2) M6(4.4,-0.4) M7(4.4,0.4) M8(4.4,1.2) M9(4.4,2) M10(4.4,2.8) M11(4.4,3.6) M12(4.4,4.4)
CAPC100X50X55L15N
  rrect 0.41x0.6 smd: 1(-0.495,0) 2(0.495,0)
CAPC100X50X55L20N
  rrect 0.49x0.6 smd: 1(-0.455,0) 2(0.455,0)
CAPC100X50X55L25N
  rrect 0.54x0.6 smd: 1(-0.43,0) 2(0.43,0)
CAPC127X200X102L25
  rrect 0.76x2.03 smd: 1(-0.635,0) 2(0.635,0)
CAPC160X80X87L35N
  rrect 0.92x0.97 smd: 1(-0.775,0) 2(0.775,0)
CAPC160X80X90L25N
  rrect 0.74x0.93 smd: 1(-0.845,0) 2(0.845,0)
CAPC160X80X90L35N
  rrect 0.89x0.93 smd: 1(-0.77,0) 2(0.77,0)
CAPC200X125X135L45N
  rrect 1.05x1.38 smd: 1(-0.89,0) 2(0.89,0)
CAPC200X125X145L30N
  rrect 0.89x1.47 smd: 1(-1.015,0) 2(1.015,0)
CAPC200X125X150L55N
  rrect 1.33x1.51 smd: 1(-0.865,0) 2(0.865,0)
CAPC320X160X190L30N
  rrect 0.89x1.82 smd: 1(-1.615,0) 2(1.615,0)
CAPC320X250X280L60N
  rrect 1.37x2.81 smd: 1(-1.42,0) 2(1.42,0)
CAPC1608X73N
  rect 0.9x0.95 smd: 1(-0.75,0) 2(0.75,0)
CAPC1608X90N
  rrect 0.92x0.98 smd: 1(-0.775,0) 2(0.775,0)
CAPC2013X94N
  rect 1.15x1.45 smd: 1(-0.9,0) 2(0.9,0)
CAPC2013X100N
  rect 0.95x1.45 smd: 1(-1,0) 2(1,0)
CAPC2013X145N
  rrect 1.07x1.47 smd: 1(-0.92,0) 2(0.92,0)
CAPC3225X270N
  rect 1.1x2.7 smd: 1(-1.55,0) 2(1.55,0)
CAPC3317X190N
  rect 0.85x1.9 smd: 1(-1.75,0) 2(1.75,0)
CAPPAD4750W80L3950D2150
  rect 1.5x1.5 hole 1: 1(-23.75,0)
  round 1.5 hole 1: 2(23.75,0)
INDC1608X95N
  rect 1x1 smd: 1(-0.75,0) 2(0.75,0)
ITT_DL1-156RW-6B
  round 1.59 hole 1.06: A1(-38.73,-6.35) A2(-38.73,-3.81) A3(-38.73,-1.27) A4(-38.73,1.27) A5(-38.73,3.81) A6(-38.73,6.35) AA1(33.65,-6.35) AA2(33.65,-3.81) AA3(33.65,-1.27) AA4(33.65,1.27) AA5(33.65,3.81) AA6(33.65,6.35) AB1(36.19,-6.35) AB2(36.19,-3.81) AB3(36.19,-1.27) AB4(36.19,1.27) AB5(36.19,3.81) AB6(36.19,6.35) AC1(38.73,-6.35) AC2(38.73,-3.81) AC3(38.73,-1.27) AC4(38.73,1.27) AC5(38.73,3.81) AC6(38.73,6.35) B1(-36.19,-6.35) B2(-36.19,-3.81) B3(-36.19,-1.27) B4(-36.19,1.27) B5(-36.19,3.81) B6(-36.19,6.35) C1(-33.65,-6.35) C2(-33.65,-3.81) C3(-33.65,-1.27) C4(-33.65,1.27) C5(-33.65,3.81) C6(-33.65,6.35) D1(-31.11,-6.35) D2(-31.11,-3.81) D3(-31.11,-1.27) D4(-31.11,1.27) D5(-31.11,3.81) D6(-31.11,6.35) E1(-28.57,-6.35) E2(-28.57,-3.81) E3(-28.57,-1.27) E4(-28.57,1.27) E5(-28.57,3.81) E6(-28.57,6.35) F1(-26.03,-6.35) F2(-26.03,-3.81) F3(-26.03,-1.27) F4(-26.03,1.27) F5(-26.03,3.81) F6(-26.03,6.35) G1(-23.49,-6.35) G2(-23.49,-3.81) G3(-23.49,-1.27) G4(-23.49,1.27) G5(-23.49,3.81) G6(-23.49,6.35) H1(-20.95,-6.35) H2(-20.95,-3.81) H3(-20.95,-1.27) H4(-20.95,1.27) H5(-20.95,3.81) H6(-20.95,6.35) J1(-18.41,-6.35) J2(-18.41,-3.81) J3(-18.41,-1.27) J4(-18.41,1.27) J5(-18.41,3.81) J6(-18.41,6.35) K1(-15.87,-6.35) K2(-15.87,-3.81) K3(-15.87,-1.27) K4(-15.87,1.27) K5(-15.87,3.81) K6(-15.87,6.35) L1(-13.33,-6.35) L2(-13.33,-3.81) L3(-13.33,-1.27) L4(-13.33,1.27) L5(-13.33,3.81) L6(-13.33,6.35) M1(-10.79,-6.35) M2(-10.79,-3.81) M3(-10.79,-1.27) M4(-10.79,1.27) M5(-10.79,3.81) M6(-10.79,6.35) N1(-8.25,-6.35) N2(-8.25,-3.81) N3(-8.25,-1.27) N4(-8.25,1.27) N5(-8.25,3.81) N6(-8.25,6.35) P1(8.25,-6.35) P2(8.25,-3.81) P3(8.25,-1.27) P4(8.25,1.27) P5(8.25,3.81) P6(8.25,6.35) R1(10.79,-6.35) R2(10.79,-3.81) R3(10.79,-1.27) R4(10.79,1.27) R5(10.79,3.81) R6(10.79,6.35) S1(13.33,-6.35) S2(13.33,-3.81) S3(13.33,-1.27) S4(13.33,1.27) S5(13.33,3.81) S6(13.33,6.35) T1(15.87,-6.35) T2(15.87,-3.81) T3(15.87,-1.27) T4(15.87,1.27) T5(15.87,3.81) T6(15.87,6.35) U1(18.41,-6.35) U2(18.41,-3.81) U3(18.41,-1.27) U4(18.41,1.27) U5(18.41,3.81) U6(18.41,6.35) V1(20.95,-6.35) V2(20.95,-3.81) V3(20.95,-1.27) V4(20.95,1.27) V5(20.95,3.81) V6(20.95,6.35) W1(23.49,-6.35) W2(23.49,-3.81) W3(23.49,-1.27) W4(23.49,1.27) W5(23.49,3.81) W6(23.49,6.35) X1(26.03,-6.35) X2(26.03,-3.81) X3(26.03,-1.27) X4(26.03,1.27) X5(26.03,3.81) X6(26.03,6.35) Y1(28.57,-6.35) Y2(28.57,-3.81) Y3(28.57,-1.27) Y4(28.57,1.27) Y5(28.57,3.81) Y6(28.57,6.35) Z1(31.11,-6.35) Z2(31.11,-3.81) Z3(31.11,-1.27) Z4(31.11,1.27) Z5(31.11,3.81) Z6(31.11,6.35)
  round 4.77 hole 3.18: MT1(-50.01,8.13) MT2(-50.01,-8.13) MT3(50.01,8.13) MT4(50.01,-8.13)
LINEAR_DE14MA
  rect 0.25x0.7 smd: 1(-1.5,-1.4) 2(-1,-1.4) 3(-0.5,-1.4) 5(0.5,-1.4) 6(1,-1.4) 7(1.5,-1.4) 8(1.5,1.4) 10(0.5,1.4) 11(0,1.4) 12(-0.5,1.4) 13(-1,1.4) 14(-1.5,1.4)
  custom 1.805x2.575 smd: 4(0,-1.4)
  custom 1.07x2.575 smd: 9(1,1.4)
MINICIRCUITS_ADT1-1WT
  rrect 1.65x2.54 smd: 1(-2.54,-2.54) 2(0,-2.54) 3(2.54,-2.54) 4(2.54,2.54) 5(0,2.54) 6(-2.54,2.54)
MOLEX_0022112032
  rect 1.65x1.65 hole 1.1: 1(0,0)
  round 1.65 hole 1.1: 2(2.54,0) 3(5.08,0)
MTG_4-E
  round 5.35 hole 3.3: 1(0,0)
PSON4P210_320X250X80L70X90N
  rrect 1.01x0.8 smd: 1(-1.05,-0.8) 2(1.05,-0.8) 3(1.05,0.8) 4(-1.05,0.8)
QFN17P50_300X300X80L40X24T130N
  rrect 0.26x0.86 smd: 1(-0.75,-1.435) 2(-0.25,-1.435) 3(0.25,-1.435) 4(0.75,-1.435) 9(0.75,1.435) 10(0.25,1.435) 11(-0.25,1.435) 12(-0.75,1.435)
  rrect 0.86x0.26 smd: 5(1.435,-0.75) 6(1.435,-0.25) 7(1.435,0.25) 8(1.435,0.75) 13(-1.435,0.75) 14(-1.435,0.25) 15(-1.435,-0.25) 16(-1.435,-0.75)
  rect 1.3x1.3 smd: 17(0,0)
QFN21P65_500X500X100L55X30T300N
  rrect 0.34x1.05 smd: 1(-1.3,-2.36) 2(-0.65,-2.36) 3(0,-2.36) 4(0.65,-2.36) 5(1.3,-2.36) 11(1.3,2.36) 12(0.65,2.36) 13(0,2.36) 14(-0.65,2.36) 15(-1.3,2.36)
  rrect 1.05x0.34 smd: 6(2.36,-1.3) 7(2.36,-0.65) 8(2.36,0) 9(2.36,0.65) 10(2.36,1.3) 16(-2.36,1.3) 17(-2.36,0.65) 18(-2.36,0) 19(-2.36,-0.65) 20(-2.36,-1.3)
  rect 3x3 smd: 21(0,0)
QFN65P50_900X900X100L40X24T770N
  rrect 0.26x0.84 smd: 1(-3.75,-4.47) 2(-3.25,-4.47) 3(-2.75,-4.47) 4(-2.25,-4.47) 5(-1.75,-4.47) 6(-1.25,-4.47) 7(-0.75,-4.47) 8(-0.25,-4.47) 9(0.25,-4.47) 10(0.75,-4.47) 11(1.25,-4.47) 12(1.75,-4.47) 13(2.25,-4.47) 14(2.75,-4.47) 15(3.25,-4.47) 16(3.75,-4.47) 33(3.75,4.47) 34(3.25,4.47) 35(2.75,4.47) 36(2.25,4.47) 37(1.75,4.47) 38(1.25,4.47) 39(0.75,4.47) 40(0.25,4.47) 41(-0.25,4.47) 42(-0.75,4.47) 43(-1.25,4.47) 44(-1.75,4.47) 45(-2.25,4.47) 46(-2.75,4.47) 47(-3.25,4.47) 48(-3.75,4.47)
  rrect 0.84x0.26 smd: 17(4.47,-3.75) 18(4.47,-3.25) 19(4.47,-2.75) 20(4.47,-2.25) 21(4.47,-1.75) 22(4.47,-1.25) 23(4.47,-0.75) 24(4.47,-0.25) 25(4.47,0.25) 26(4.47,0.75) 27(4.47,1.25) 28(4.47,1.75) 29(4.47,2.25) 30(4.47,2.75) 31(4.47,3.25) 32(4.47,3.75) 49(-4.47,3.75) 50(-4.47,3.25) 51(-4.47,2.75) 52(-4.47,2.25) 53(-4.47,1.75) 54(-4.47,1.25) 55(-4.47,0.75) 56(-4.47,0.25) 57(-4.47,-0.25) 58(-4.47,-0.75) 59(-4.47,-1.25) 60(-4.47,-1.75) 61(-4.47,-2.25) 62(-4.47,-2.75) 63(-4.47,-3.25) 64(-4.47,-3.75)
  rrect 7.7x7.7 smd: 65(0,0)
RESC100X50X40L25
  rrect 0.4x0.6 smd: 1(-0.45,0) 2(0.45,0)
RESC155X85X50L30N
  rrect 0.86x0.98 smd: 1(-0.75,0) 2(0.75,0)
RESC160X80X55L30N
  rrect 0.94x1.02 smd: 1(-0.79,0) 2(0.79,0)
RESC160X85X50L30
  rrect 0.5x0.9 smd: 1(-0.75,0) 2(0.75,0)
RESC160X85X55L30N
  rrect 0.87x0.98 smd: 1(-0.78,0) 2(0.78,0)
RESC205X125X50L35N
  rrect 0.92x1.42 smd: 1(-1,0) 2(1,0)
RESC1609X50N
  rect 0.72x0.98 smd: 1(-0.69,0) 2(0.69,0)
RESC3116X65N
  rect 1.15x1.8 smd: 1(-1.45,0) 2(1.45,0)
RESC5025X70N
  rect 1.25x2.7 smd: 1(-2.3,0) 2(2.3,0)
SAMTEC_ASP-134488-01
  round 0.635 hole 1.27 unplated: (-27.191,-3.05) (27.189,0)
  round 0.64 smd: A1(24.765,5.715) A2(23.495,5.715) A3(22.225,5.715) A4(20.955,5.715) A5(19.685,5.715) A6(18.415,5.715) A7(17.145,5.715) A8(15.875,5.715) A9(14.605,5.715) A10(13.335,5.715) A11(12.065,5.715) A12(10.795,5.715) A13(9.525,5.715) A14(8.255,5.715) A15(6.985,5.715) A16(5.715,5.715) A17(4.445,5.715) A18(3.175,5.715) A19(1.905,5.715) A20(0.635,5.715) A21(-0.635,5.715) A22(-1.905,5.715) A23(-3.175,5.715) A24(-4.445,5.715) A25(-5.715,5.715) A26(-6.985,5.715) A27(-8.255,5.715) A28(-9.525,5.715) A29(-10.795,5.715) A30(-12.065,5.715) A31(-13.335,5.715) A32(-14.605,5.715) A33(-15.875,5.715) A34(-17.145,5.715) A35(-18.415,5.715) A36(-19.685,5.715) A37(-20.955,5.715) A38(-22.225,5.715) A39(-23.495,5.715) A40(-24.765,5.715) B1(24.765,4.445) B2(23.495,4.445) B3(22.225,4.445) B4(20.955,4.445) B5(19.685,4.445) B6(18.415,4.445) B7(17.145,4.445) B8(15.875,4.445) B9(14.605,4.445) B10(13.335,4.445) B11(12.065,4.445) B12(10.795,4.445) B13(9.525,4.445) B14(8.255,4.445) B15(6.985,4.445) B16(5.715,4.445) B17(4.445,4.445) B18(3.175,4.445) B19(1.905,4.445) B20(0.635,4.445) B21(-0.635,4.445) B22(-1.905,4.445) B23(-3.175,4.445) B24(-4.445,4.445) B25(-5.715,4.445) B26(-6.985,4.445) B27(-8.255,4.445) B28(-9.525,4.445) B29(-10.795,4.445) B30(-12.065,4.445) B31(-13.335,4.445) B32(-14.605,4.445) B33(-15.875,4.445) B34(-17.145,4.445) B35(-18.415,4.445) B36(-19.685,4.445) B37(-20.955,4.445) B38(-22.225,4.445) B39(-23.495,4.445) B40(-24.765,4.445) C1(24.765,3.175) C2(23.495,3.175) C3(22.225,3.175) C4(20.955,3.175) C5(19.685,3.175) C6(18.415,3.175) C7(17.145,3.175) C8(15.875,3.175) C9(14.605,3.175) C10(13.335,3.175) C11(12.065,3.175) C12(10.795,3.175) C13(9.525,3.175) C14(8.255,3.175) C15(6.985,3.175) C16(5.715,3.175) C17(4.445,3.175) C18(3.175,3.175) C19(1.905,3.175) C20(0.635,3.175) C21(-0.635,3.175) C22(-1.905,3.175) C23(-3.175,3.175) C24(-4.445,3.175) C25(-5.715,3.175) C26(-6.985,3.175) C27(-8.255,3.175) C28(-9.525,3.175) C29(-10.795,3.175) C30(-12.065,3.175) C31(-13.335,3.175) C32(-14.605,3.175) C33(-15.875,3.175) C34(-17.145,3.175) C35(-18.415,3.175) C36(-19.685,3.175) C37(-20.955,3.175) C38(-22.225,3.175) C39(-23.495,3.175) C40(-24.765,3.175) D1(24.765,1.905) D2(23.495,1.905) D3(22.225,1.905) D4(20.955,1.905) D5(19.685,1.905) D6(18.415,1.905) D7(17.145,1.905) D8(15.875,1.905) D9(14.605,1.905) D10(13.335,1.905) D11(12.065,1.905) D12(10.795,1.905) D13(9.525,1.905) D14(8.255,1.905) D15(6.985,1.905) D16(5.715,1.905) D17(4.445,1.905) D18(3.175,1.905) D19(1.905,1.905) D20(0.635,1.905) D21(-0.635,1.905) D22(-1.905,1.905) D23(-3.175,1.905) D24(-4.445,1.905) D25(-5.715,1.905) D26(-6.985,1.905) D27(-8.255,1.905) D28(-9.525,1.905) D29(-10.795,1.905) D30(-12.065,1.905) D31(-13.335,1.905) D32(-14.605,1.905) D33(-15.875,1.905) D34(-17.145,1.905) D35(-18.415,1.905) D36(-19.685,1.905) D37(-20.955,1.905) D38(-22.225,1.905) D39(-23.495,1.905) D40(-24.765,1.905) E1(24.765,0.635) E2(23.495,0.635) E3(22.225,0.635) E4(20.955,0.635) E5(19.685,0.635) E6(18.415,0.635) E7(17.145,0.635) E8(15.875,0.635) E9(14.605,0.635) E10(13.335,0.635) E11(12.065,0.635) E12(10.795,0.635) E13(9.525,0.635) E14(8.255,0.635) E15(6.985,0.635) E16(5.715,0.635) E17(4.445,0.635) E18(3.175,0.635) E19(1.905,0.635) E20(0.635,0.635) E21(-0.635,0.635) E22(-1.905,0.635) E23(-3.175,0.635) E24(-4.445,0.635) E25(-5.715,0.635) E26(-6.985,0.635) E27(-8.255,0.635) E28(-9.525,0.635) E29(-10.795,0.635) E30(-12.065,0.635) E31(-13.335,0.635) E32(-14.605,0.635) E33(-15.875,0.635) E34(-17.145,0.635) E35(-18.415,0.635) E36(-19.685,0.635) E37(-20.955,0.635) E38(-22.225,0.635) E39(-23.495,0.635) E40(-24.765,0.635) F1(24.765,-0.635) F2(23.495,-0.635) F3(22.225,-0.635) F4(20.955,-0.635) F5(19.685,-0.635) F6(18.415,-0.635) F7(17.145,-0.635) F8(15.875,-0.635) F9(14.605,-0.635) F10(13.335,-0.635) F11(12.065,-0.635) F12(10.795,-0.635) F13(9.525,-0.635) F14(8.255,-0.635) F15(6.985,-0.635) F16(5.715,-0.635) F17(4.445,-0.635) F18(3.175,-0.635) F19(1.905,-0.635) F20(0.635,-0.635) F21(-0.635,-0.635) F22(-1.905,-0.635) F23(-3.175,-0.635) F24(-4.445,-0.635) F25(-5.715,-0.635) F26(-6.985,-0.635) F27(-8.255,-0.635) F28(-9.525,-0.635) F29(-10.795,-0.635) F30(-12.065,-0.635) F31(-13.335,-0.635) F32(-14.605,-0.635) F33(-15.875,-0.635) F34(-17.145,-0.635) F35(-18.415,-0.635) F36(-19.685,-0.635) F37(-20.955,-0.635) F38(-22.225,-0.635) F39(-23.495,-0.635) F40(-24.765,-0.635) G1(24.765,-1.905) G2(23.495,-1.905) G3(22.225,-1.905) G4(20.955,-1.905) G5(19.685,-1.905) G6(18.415,-1.905) G7(17.145,-1.905) G8(15.875,-1.905) G9(14.605,-1.905) G10(13.335,-1.905) G11(12.065,-1.905) G12(10.795,-1.905) G13(9.525,-1.905) G14(8.255,-1.905) G15(6.985,-1.905) G16(5.715,-1.905) G17(4.445,-1.905) G18(3.175,-1.905) G19(1.905,-1.905) G20(0.635,-1.905) G21(-0.635,-1.905) G22(-1.905,-1.905) G23(-3.175,-1.905) G24(-4.445,-1.905) G25(-5.715,-1.905) G26(-6.985,-1.905) G27(-8.255,-1.905) G28(-9.525,-1.905) G29(-10.795,-1.905) G30(-12.065,-1.905) G31(-13.335,-1.905) G32(-14.605,-1.905) G33(-15.875,-1.905) G34(-17.145,-1.905) G35(-18.415,-1.905) G36(-19.685,-1.905) G37(-20.955,-1.905) G38(-22.225,-1.905) G39(-23.495,-1.905) G40(-24.765,-1.905) H1(24.765,-3.175) H2(23.495,-3.175) H3(22.225,-3.175) H4(20.955,-3.175) H5(19.685,-3.175) H6(18.415,-3.175) H7(17.145,-3.175) H8(15.875,-3.175) H9(14.605,-3.175) H10(13.335,-3.175) H11(12.065,-3.175) H12(10.795,-3.175) H13(9.525,-3.175) H14(8.255,-3.175) H15(6.985,-3.175) H16(5.715,-3.175) H17(4.445,-3.175) H18(3.175,-3.175) H19(1.905,-3.175) H20(0.635,-3.175) H21(-0.635,-3.175) H22(-1.905,-3.175) H23(-3.175,-3.175) H24(-4.445,-3.175) H25(-5.715,-3.175) H26(-6.985,-3.175) H27(-8.255,-3.175) H28(-9.525,-3.175) H29(-10.795,-3.175) H30(-12.065,-3.175) H31(-13.335,-3.175) H32(-14.605,-3.175) H33(-15.875,-3.175) H34(-17.145,-3.175) H35(-18.415,-3.175) H36(-19.685,-3.175) H37(-20.955,-3.175) H38(-22.225,-3.175) H39(-23.495,-3.175) H40(-24.765,-3.175) J1(24.765,-4.445) J2(23.495,-4.445) J3(22.225,-4.445) J4(20.955,-4.445) J5(19.685,-4.445) J6(18.415,-4.445) J7(17.145,-4.445) J8(15.875,-4.445) J9(14.605,-4.445) J10(13.335,-4.445) J11(12.065,-4.445) J12(10.795,-4.445) J13(9.525,-4.445) J14(8.255,-4.445) J15(6.985,-4.445) J16(5.715,-4.445) J17(4.445,-4.445) J18(3.175,-4.445) J19(1.905,-4.445) J20(0.635,-4.445) J21(-0.635,-4.445) J22(-1.905,-4.445) J23(-3.175,-4.445) J24(-4.445,-4.445) J25(-5.715,-4.445) J26(-6.985,-4.445) J27(-8.255,-4.445) J28(-9.525,-4.445) J29(-10.795,-4.445) J30(-12.065,-4.445) J31(-13.335,-4.445) J32(-14.605,-4.445) J33(-15.875,-4.445) J34(-17.145,-4.445) J35(-18.415,-4.445) J36(-19.685,-4.445) J37(-20.955,-4.445) J38(-22.225,-4.445) J39(-23.495,-4.445) J40(-24.765,-4.445) K1(24.765,-5.715) K2(23.495,-5.715) K3(22.225,-5.715) K4(20.955,-5.715) K5(19.685,-5.715) K6(18.415,-5.715) K7(17.145,-5.715) K8(15.875,-5.715) K9(14.605,-5.715) K10(13.335,-5.715) K11(12.065,-5.715) K12(10.795,-5.715) K13(9.525,-5.715) K14(8.255,-5.715) K15(6.985,-5.715) K16(5.715,-5.715) K17(4.445,-5.715) K18(3.175,-5.715) K19(1.905,-5.715) K20(0.635,-5.715) K21(-0.635,-5.715) K22(-1.905,-5.715) K23(-3.175,-5.715) K24(-4.445,-5.715) K25(-5.715,-5.715) K26(-6.985,-5.715) K27(-8.255,-5.715) K28(-9.525,-5.715) K29(-10.795,-5.715) K30(-12.065,-5.715) K31(-13.335,-5.715) K32(-14.605,-5.715) K33(-15.875,-5.715) K34(-17.145,-5.715) K35(-18.415,-5.715) K36(-19.685,-5.715) K37(-20.955,-5.715) K38(-22.225,-5.715) K39(-23.495,-5.715) K40(-24.765,-5.715)
